# Altium PCB CW342_PCB.PcbDoc (part 1 of 3)
Units mil, origin at the board's own origin, x right, y up, seen from the top; angles counter-clockwise.
Board outline 3740.34 x 4080.75 mil, 4 copper layers (Top Layer, Layer 2 (GND), Layer 3, Bottom Layer), stack 23.756 mil thick; 89 components, 152 nets, 1082 pads, 424 vias.
Unrouted connection lines stored in the file: 58.
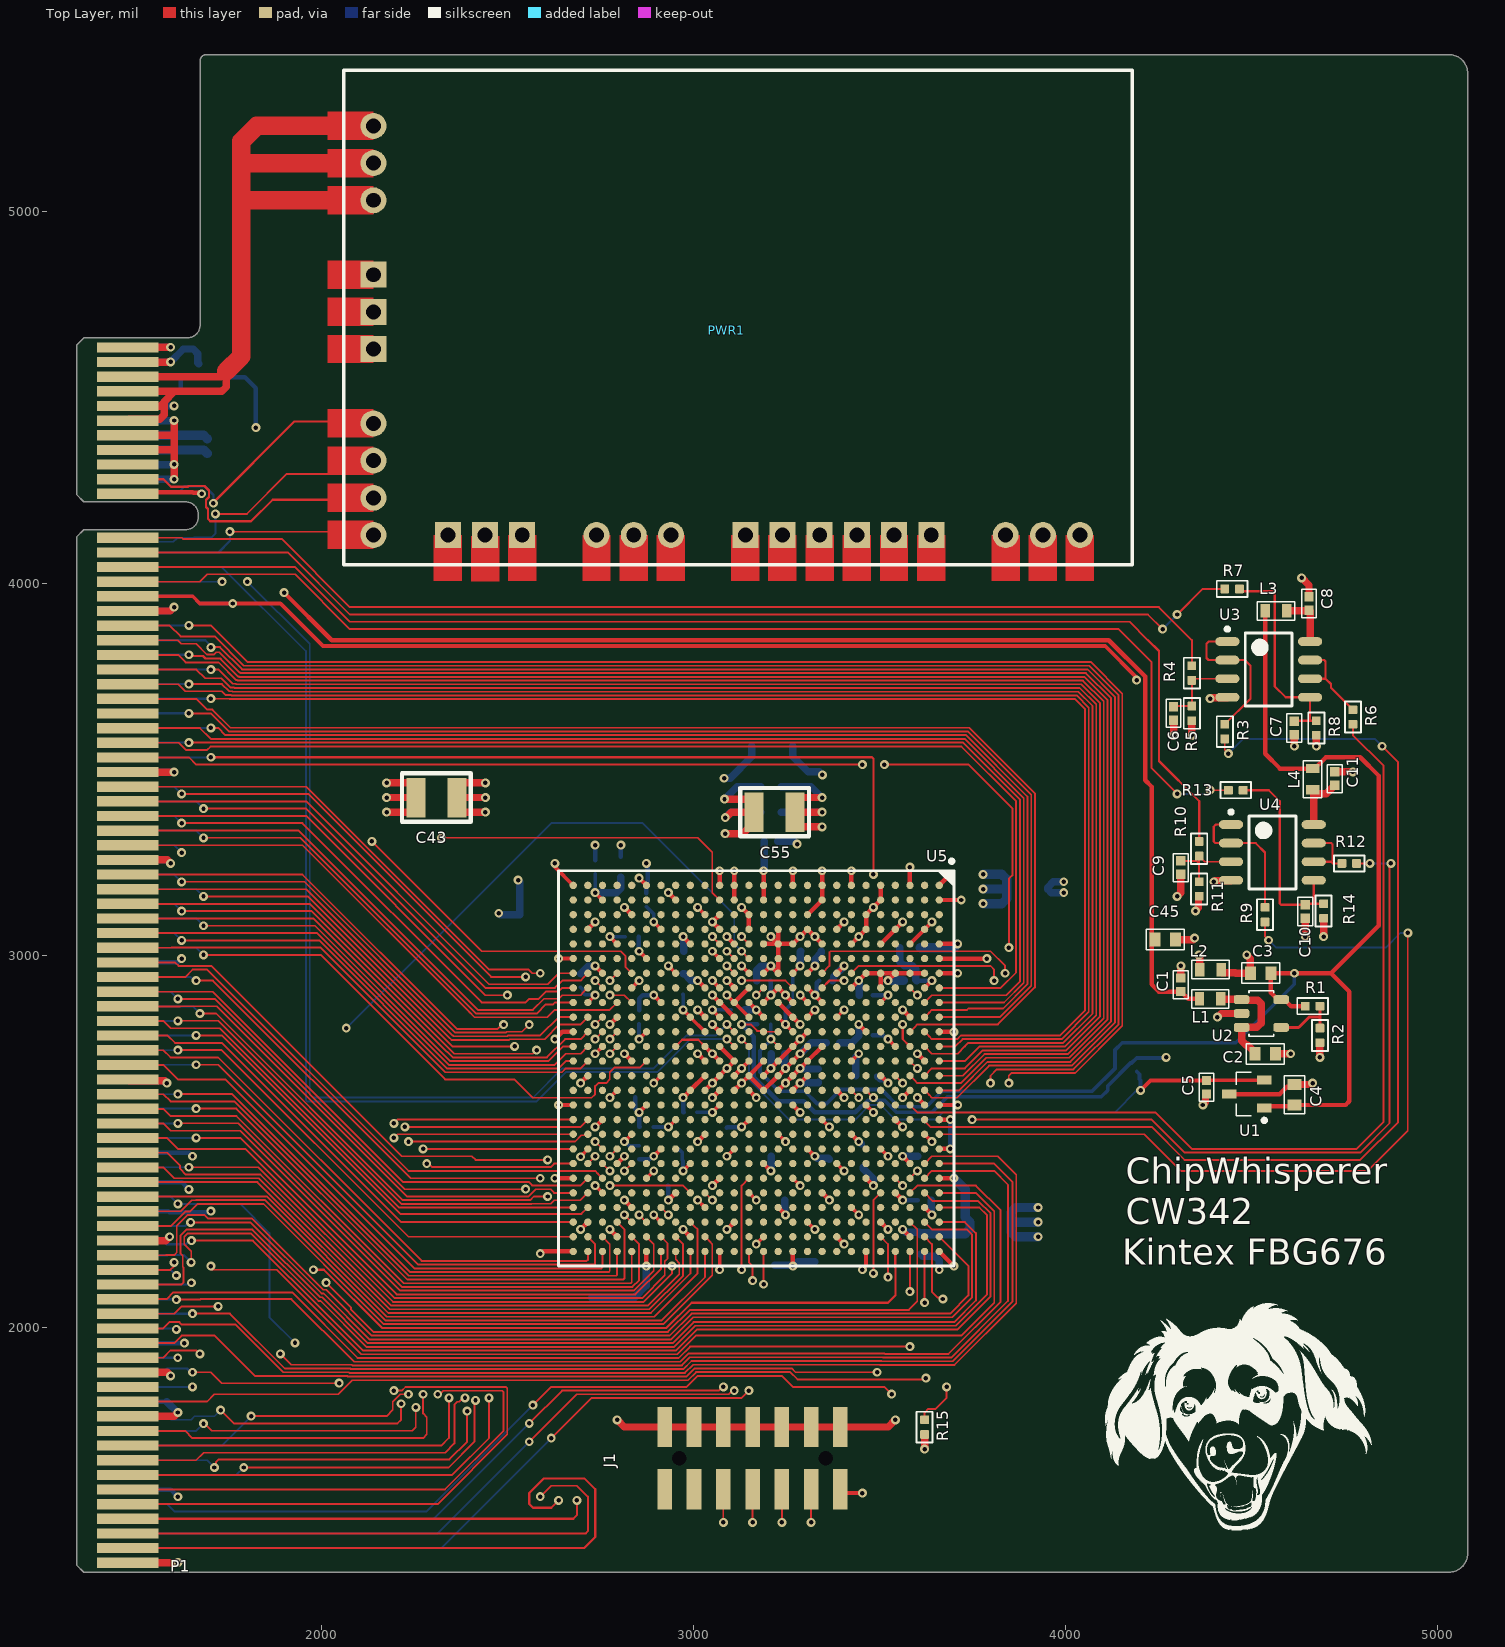
[diagram p0: Top Layer view]
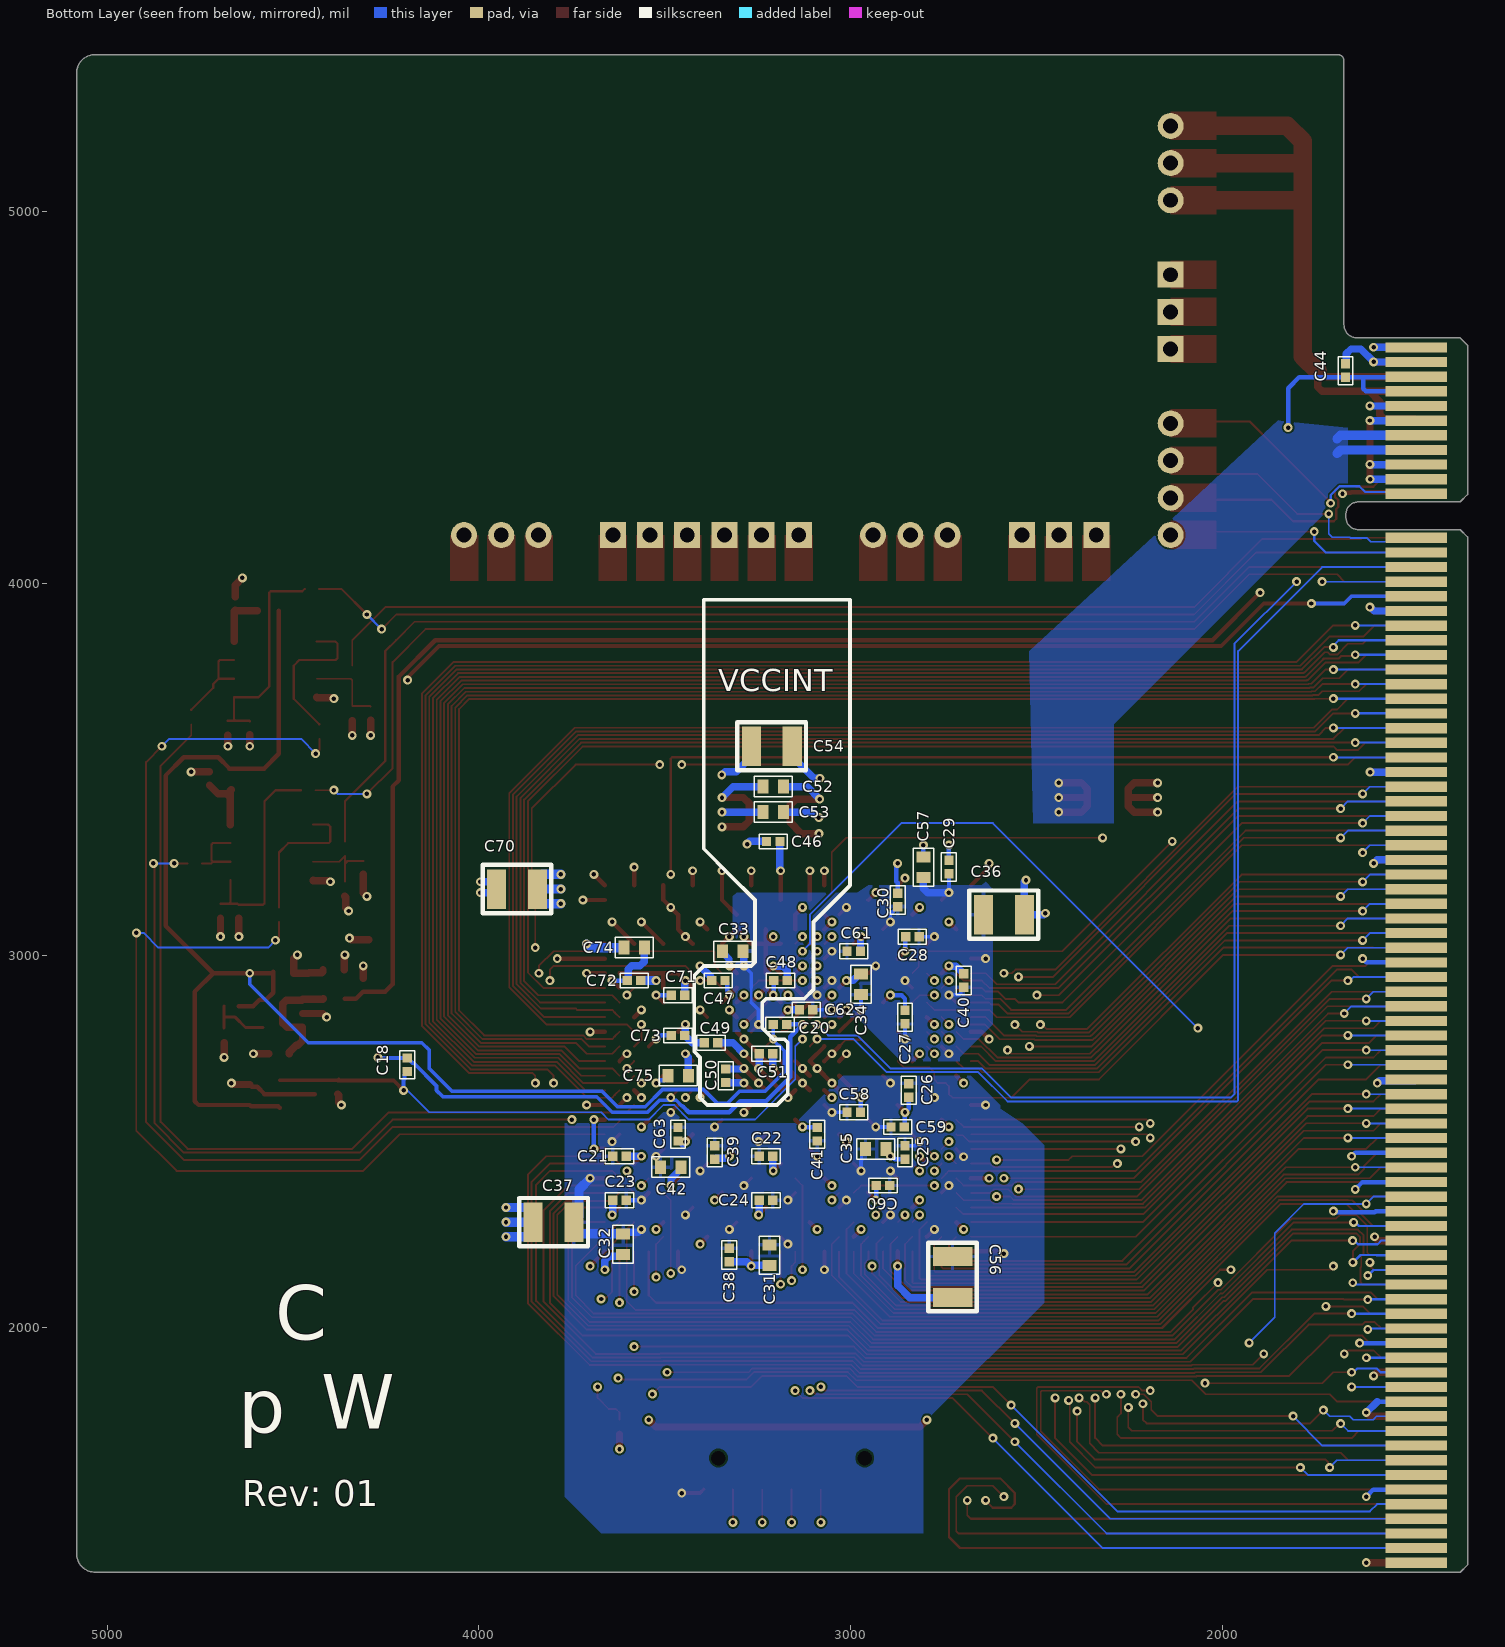
[diagram p1: Bottom Layer view, seen from below]
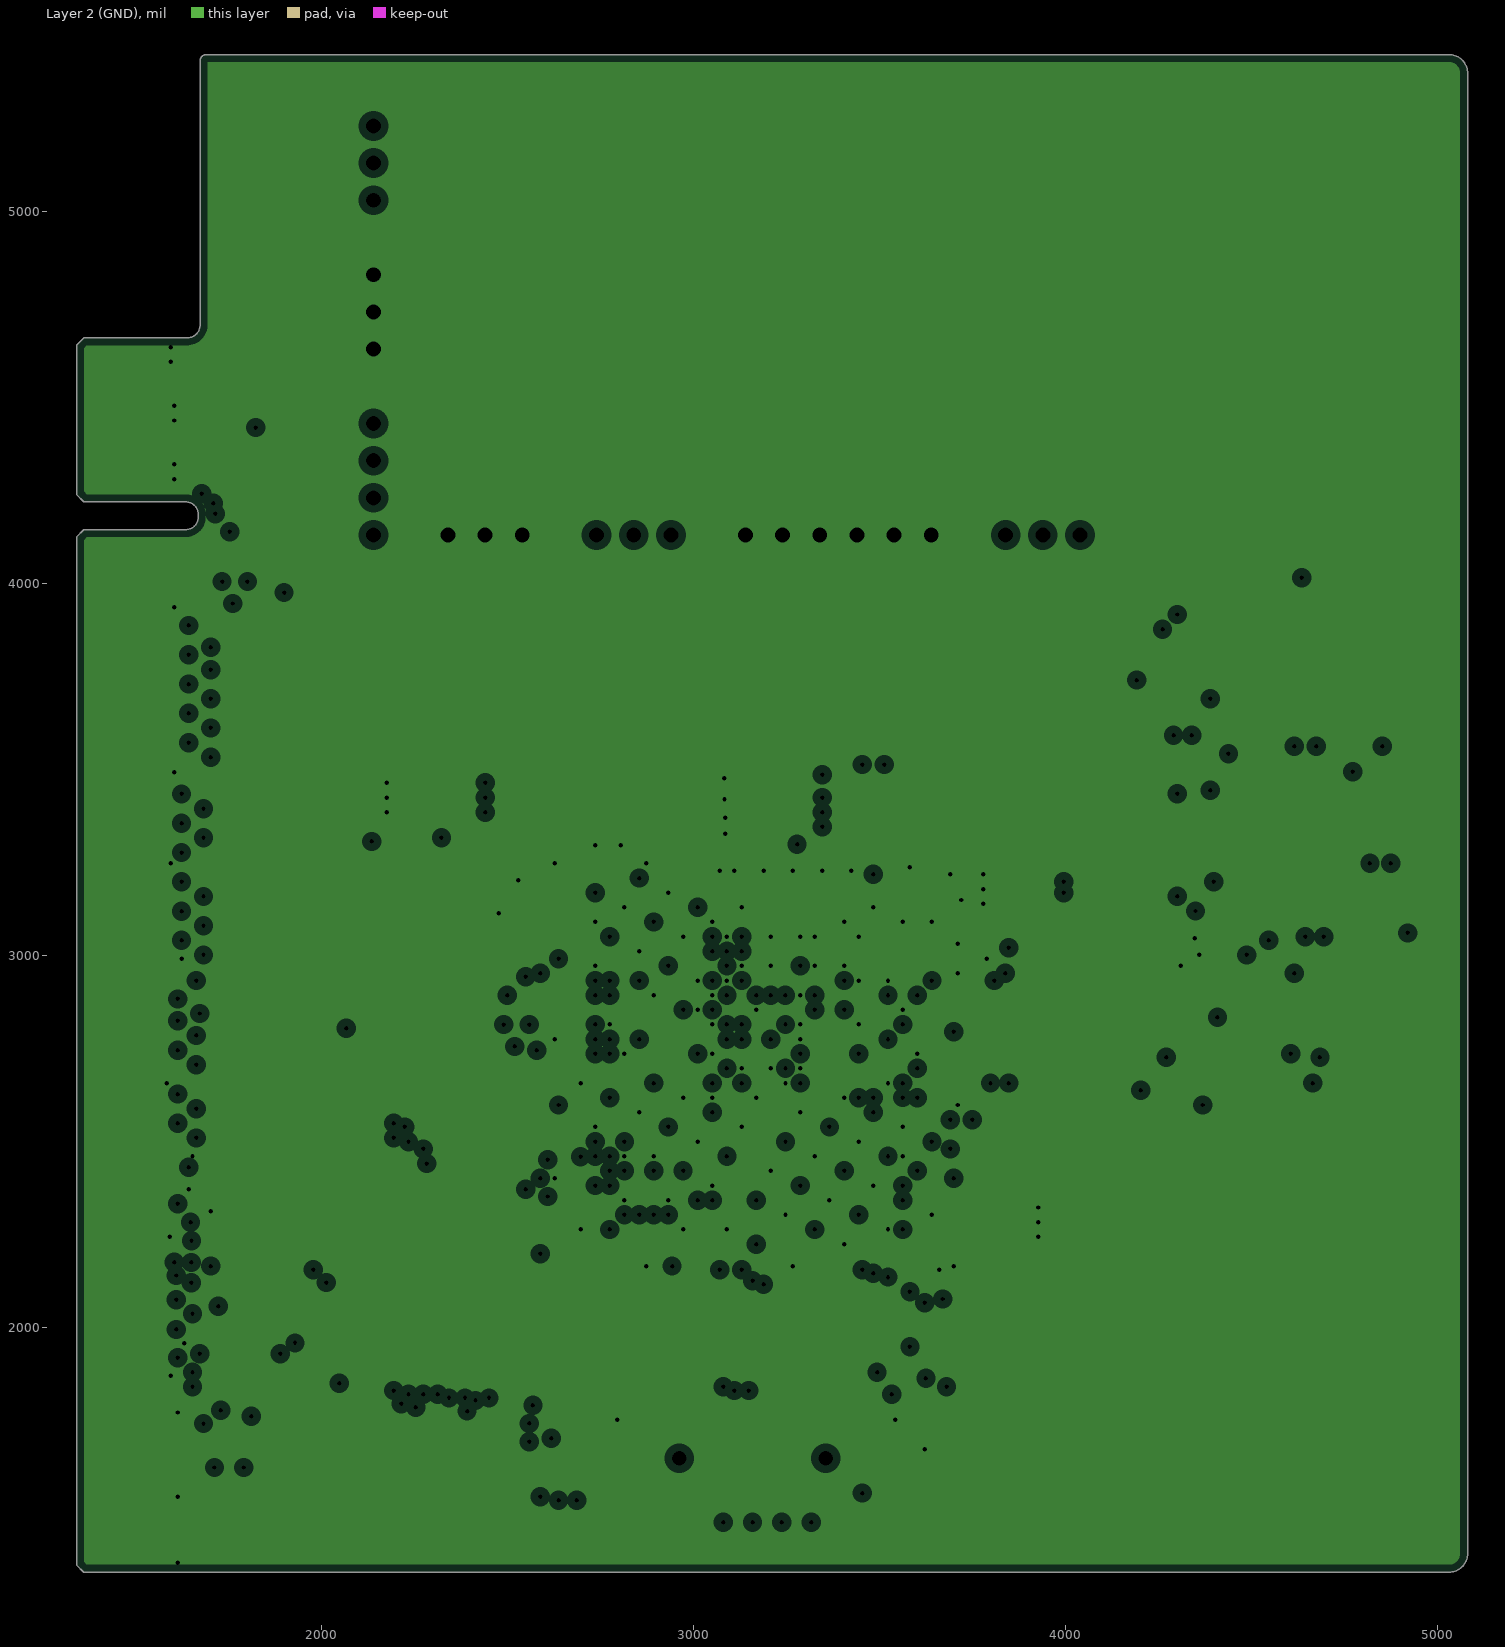
[diagram p2: Layer 2 (GND), clearances drawn from the general rule]
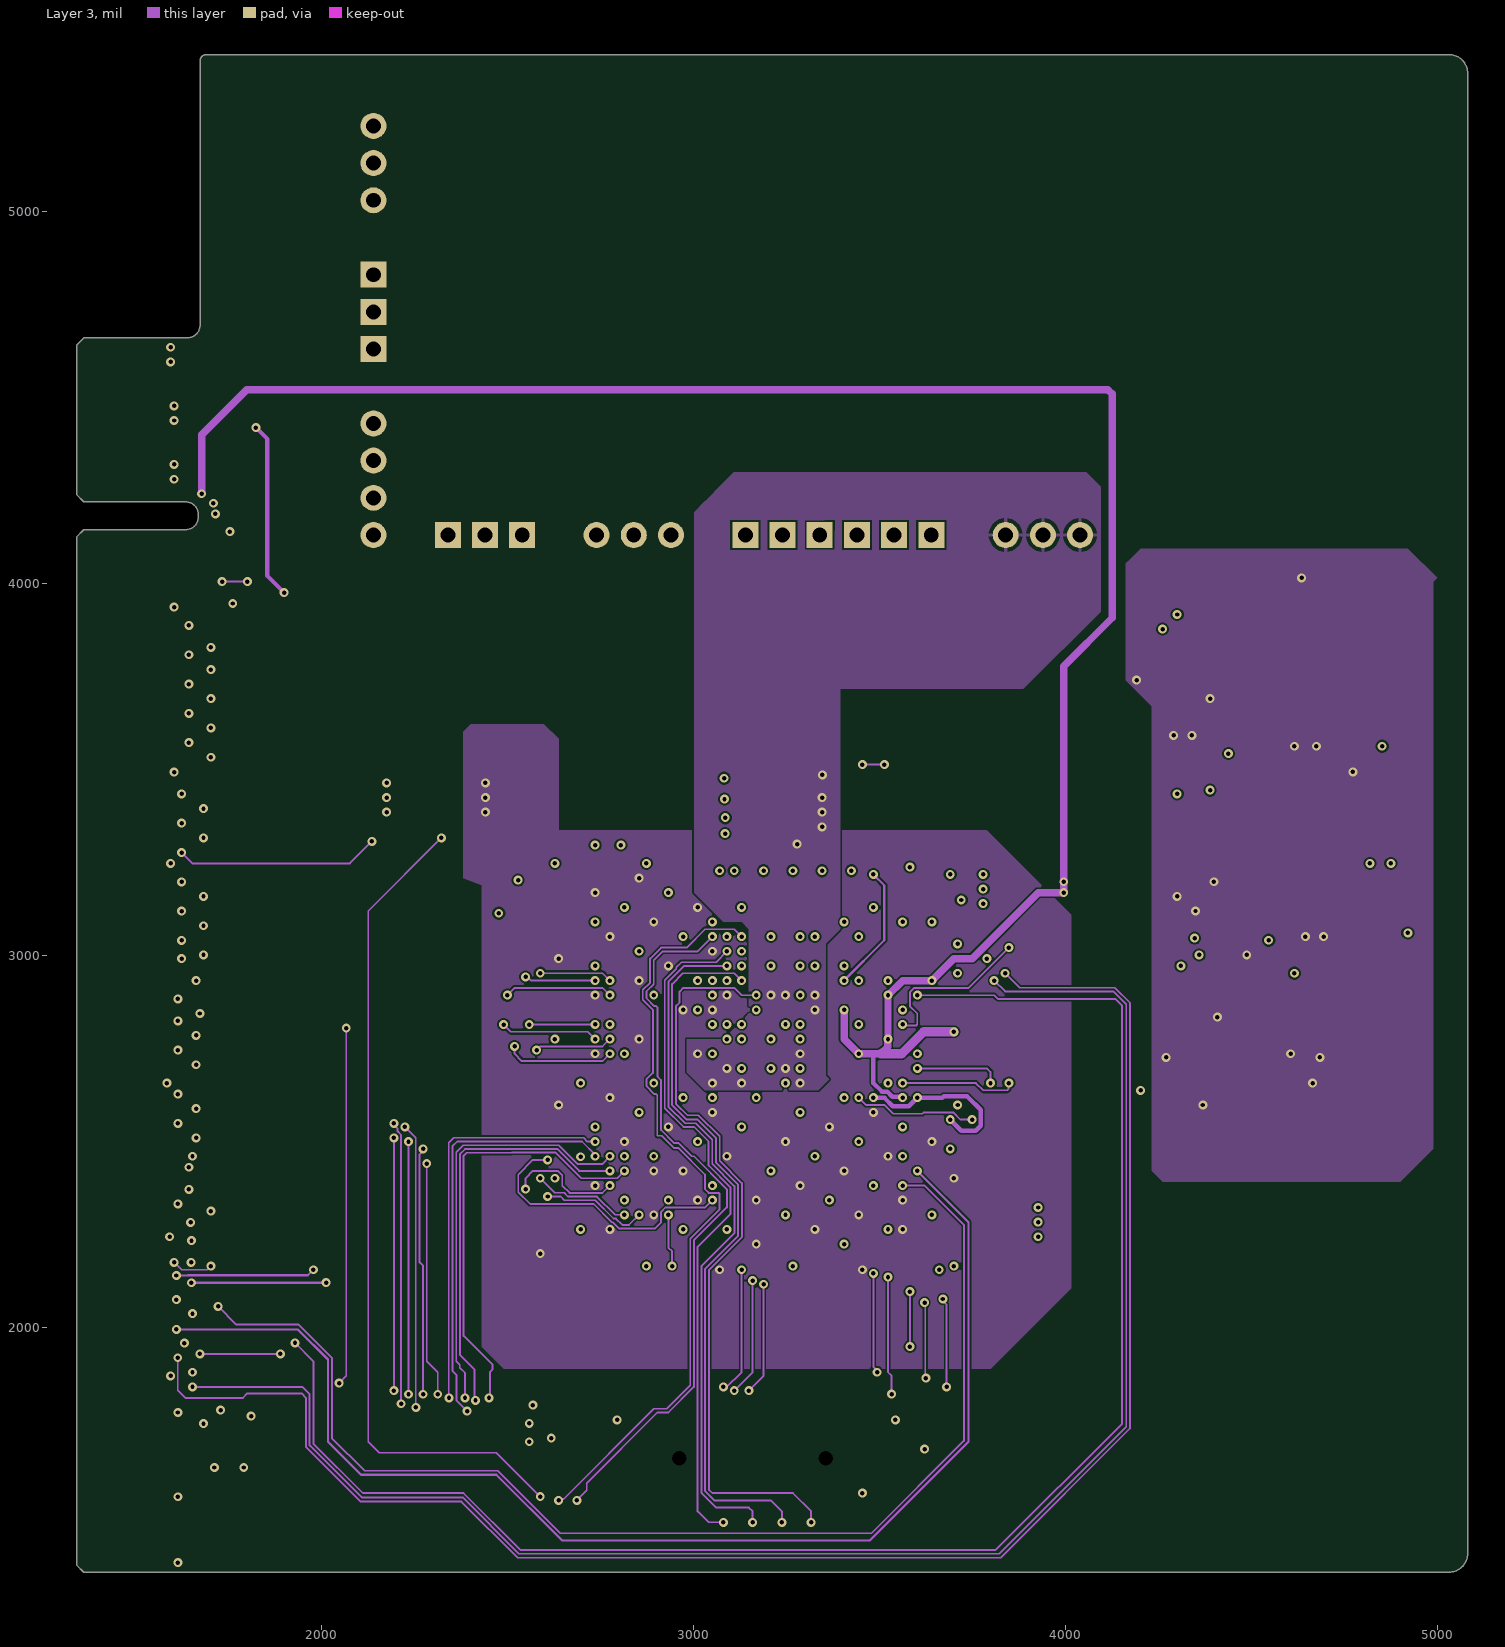
[diagram p3: Layer 3]
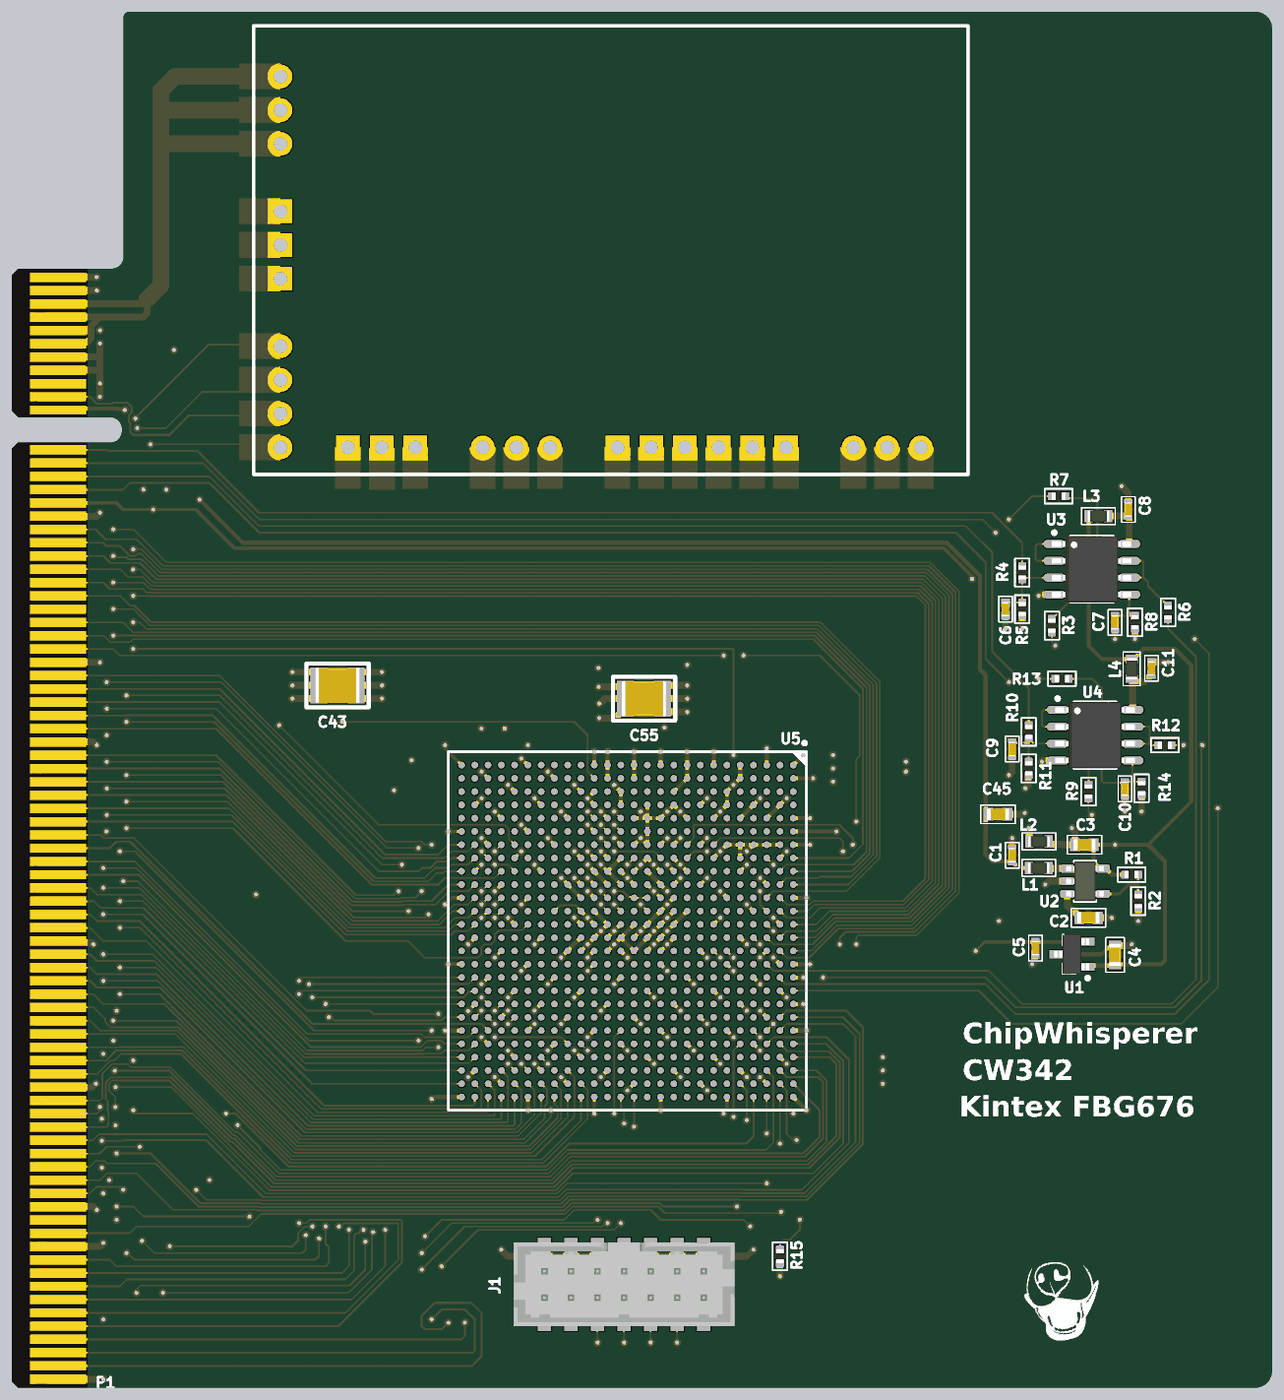
[diagram p6: 3D render of the assembled board from above, using the file's embedded part models]
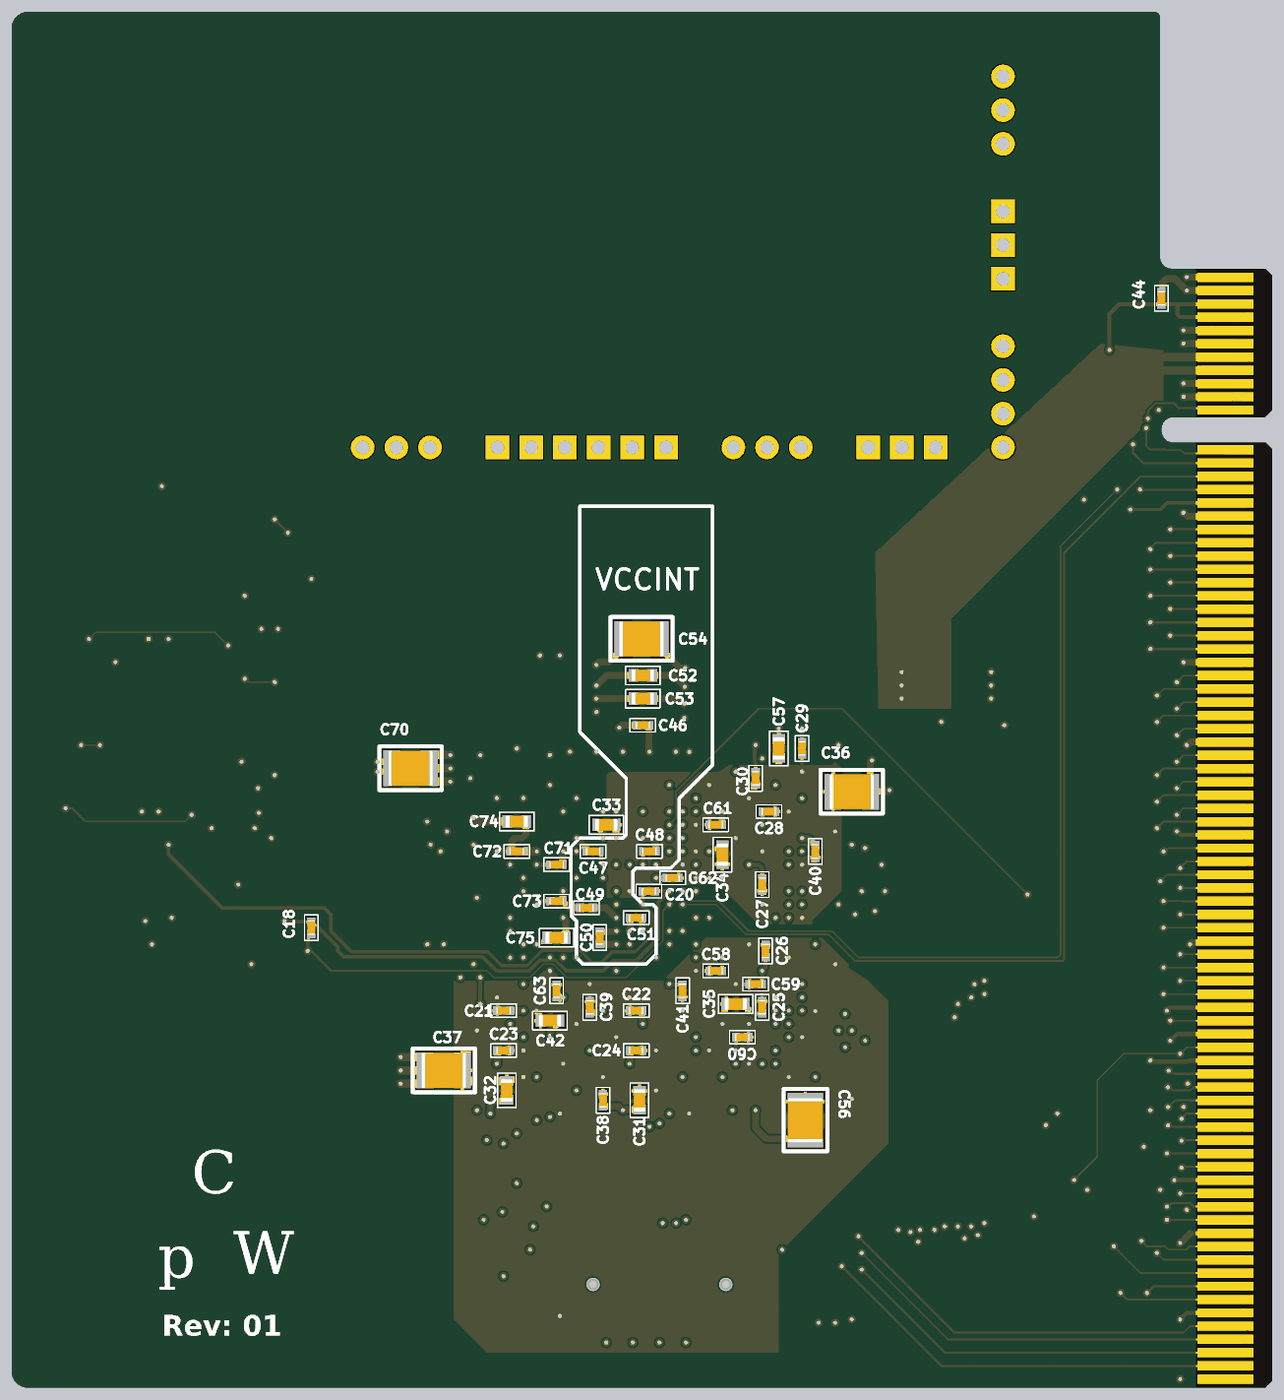
[diagram p7: 3D render of the assembled board from below, using the file's embedded part models]

## Layer stack, top to bottom
Top Solder: solder mask 0.4, Solder Resist, Dk 3.5
Top Layer: signal copper 1.4
Dielectric 2: prepreg 2.8, PP-006, Dk 4.1
Layer 2 (GND): plane copper 1.378, net GND
Dielectric 1: dielectric 12.6, FR-4, Dk 4.8
Layer 3: signal copper 1.378
Dielectric 3: prepreg 2.8, PP-006, Dk 4.1
Bottom Layer: signal copper 1.4
Bottom Solder: solder mask 0.4, Solder Resist, Dk 3.5

## Board outline
1361.35,1342.25 1341.66,1361.94 1341.66,4125.72 1361.35,4145.4 1634.97,4145.4 ccw(c1634.97,4179.43) 1669,4179.43 1669,4186.17 ccw(c1634.97,4186.17) 1634.97,4220.2 1361.35,4220.2 1341.66,4239.89 1341.66,4641.46 1361.35,4661.15 1638.98,4661.15 ccw(c1638.98,4696.17) 1674,4696.17 1674,5406 cw(c1691,5406) 1691,5423 5032,5423 cw(c5032,5373) 5082,5373 5082,1392.25 cw(c5032,1392.25) 5032,1342.25

## Design rules (kind name [scope] priority, off if disabled: settings)
BoardOutlineClearance Silk_to_Outline [(OnLayer('Top Overlay'))] p1: gap=0 ignorepadtopadclearanceinfootprint=FALSE
BoardOutlineClearance [All] p2: gap=20 ignorepadtopadclearanceinfootprint=FALSE
Clearance [All] p1: gap=5 ignorepadtopadclearanceinfootprint=FALSE except(0: Arc-Hole Track-Hole SMDPad-Hole THPad-Hole Via-Hole Fill-Hole Poly-Hole Region-Hole Text-Hole)
HoleSize [All] p1: absolutevalues=TRUE maxlimit=200 minlimit=1 maxpercent=80.000 minpercent=20.000
MinimumSolderMaskSliver [All] p1 off: minsoldermaskwidth=10
PlaneClearance [All] p1: clearance=20
PlaneConnect PlaneConnect_viaDirect [IsVia] p1: planeconnectstyle=Direct reliefexpansion=20 reliefentries=4 reliefconductorwidth=10 reliefairgap=10
PlaneConnect [All] p2: planeconnectstyle=Relief reliefexpansion=20 reliefentries=4 reliefconductorwidth=10 reliefairgap=10
PolygonConnect PolygonConnect_viaDirect [All vs isVia] p1: connectstyle=Direct reliefconductorwidth=10 reliefentries=4 polygonreliefangle="90 Angle" airgapwidth=10
PolygonConnect [All] p2: connectstyle=Relief reliefconductorwidth=10 reliefentries=4 polygonreliefangle="90 Angle" airgapwidth=10
RoutingVias [All] p1: holewidth=12 width=24 viastyle="Through Hole" minholewidth=12 minwidth=24 maxholewidth=28 maxwidth=50 viatemplateguid#1={3D63D98A-B8DD-4D8C-8428-75B7C829EE97} viatemplatename#1=v61h30m0mx0
SilkToSilkClearance [All] p1: silktosilkclearance=5
SilkToSolderMaskClearance [IsPad] p1: minsilkscreentomaskgap=5 clearancetoexposedcopper=TRUE
SolderMaskExpansion [All] p1: expansion=4 istentingtop=FALSE
Width [All] p1: maxlimit=100 minlimit=5 preferedwidth=8 midlayer1_prefwidth=5 minimp=50.000000 maximp=50.000000 favimp=50.000000
24 further rules are at their usual default settings.

## Classes and differential pairs
component class CW342_XADC: C1 C2 C3 C4 C5 C6 C7 C8 C9 C10 C11 L1 L2 L3 L4 R1 R2 R3 R4 R5 R6 R7 R8 R9 R10 R11 R12 R13 R14 U1 U2 U3 U4
component class CW342_FPGAIO_1: R15 U5
component class CW342_FPGA_PWR: C20
component class CW342_FPGA_DECOUP: C21 C22 C23 C24 C25 C26 C27 C28 C29 C30 C31 C32 C33 C34 C35 C36 C37 C38 C39 C40 C41 C42 C43 C44 C45 C46 C47 C48 C49 C50 C51 C52 C53 C54 C55 C56 C57 C58 C59 C60 C61 C62 C63 C70 C71 C72 C73 C74 C75
component class CW342_FPGA_CFG: C18 J1
component class CW342_Edge: P1 PWR1

## Components (designator, comment, footprint, x,y, rotation, side; value= is the part's Value field where it differs from the comment)
C1 "100n" CAPC0402_M 4311.02,2921.65 r90 top
C2 "1u" CAPC0603_M 4537.4,2736.22 r0 top
C3 "2u2" CAPC0603_M 4525.59,2952.76 r180 top
C4 "470n" CAPC0603_M 4616.14,2625.99 r90 top
C5 "100n" CAPC0402_M 4379.92,2646.06 r270 top
C6 "18p" CAPC0402_M 4291.34,3651.57 r270 top
C7 "18p" CAPC0402_M 4616.14,3612.2 r270 top
C8 "100n" CAPC0402_M 4655.51,3946.85 r90 top
C9 "18p" CAPC0402_M 4311.02,3236.61 r270 top
C10 "18p" CAPC0402_M 4645.67,3118.5 r270 top
C11 "100n" CAPC0402_M 4724.41,3475.98 r90 top
C18 "100n" CAPC0402_M 4192.29,2706.69 r90 bottom
C20 "100n" CAPC0402_M 3190.55,2814.96 r180 bottom
C21 "100n" CAPC0402_M 3622.05,2460.63 r180 bottom
C22 "100n" CAPC0402_M 3228.35,2460.63 r180 bottom
C23 "100n" CAPC0402_M 3622.05,2342.52 r0 bottom
C24 "100n" CAPC0402_M 3228.35,2342.52 r0 bottom
C25 "100n" CAPC0402_M 2854.33,2470.47 r270 bottom
C26 "100n" CAPC0402_M 2844.49,2637.8 r270 bottom
C27 "100n" CAPC0402_M 2854.33,2834.65 r90 bottom
C28 "100n" CAPC0402_M 2834.65,3051.18 r0 bottom
C29 "100n" CAPC0402_M 2736.22,3238.19 r90 bottom
C30 "100n" CAPC0402_M 2874.02,3149.61 r90 bottom
C31 "2u2" CAPC0603_M 3218.5,2194.88 r270 bottom
C32 "2u2" CAPC0603_M 3612.2,2224.41 r270 bottom
C33 "2u2" CAPC0603_M 3316.93,3011.81 r0 bottom
C34 "2u2" CAPC0603_M 2972.44,2923.23 r90 bottom
C35 "2u2" CAPC0603_M 2933.07,2480.32 r180 bottom
C36 "47uF" CAPC3225X20N 2588.58,3110.24 r180 bottom
C37 "47uF" CAPC3225X20N 3799.21,2283.46 r0 bottom
C38 "100n" CAPC0402_M 3326.77,2194.88 r270 bottom
C39 "100n" CAPC0402_M 3366.14,2470.47 r270 bottom
C40 "100n" CAPC0402_M 2696.85,2933.07 r90 bottom
C41 "100n" CAPC0402_M 3090.55,2519.68 r90 bottom
C42 "2u2" CAPC0603_M 3484.25,2431.1 r180 bottom
C43 "47uF" CAPC3225X20N 2309.05,3425.2 r180 top
C44 "100n" CAPC0402_M 1670,4573 r90 bottom
C45 "2u2" CAPC0603_M 4269,3043 r0 top
C46 "100n" CAPC0402_M 3208.66,3307.09 r180 bottom
C47 "100n" CAPC0402_M 3356.3,2933.07 r0 bottom
C48 "100n" CAPC0402_M 3188.98,2933.07 r180 bottom
C49 "100n" CAPC0402_M 3375.98,2765.75 r0 bottom
C50 "100n" CAPC0402_M 3336.61,2677.17 r90 bottom
C51 "100n" CAPC0402_M 3228.35,2736.22 r180 bottom
C52 "2u2" CAPC0603_M 3208.66,3454.72 r180 bottom
C53 "2u2" CAPC0603_M 3208.66,3385.83 r180 bottom
C54 "47uF" CAPC3225X20N 3212.6,3562.99 r180 bottom
C55 "47uF" CAPC3225X20N 3218.5,3385.83 r180 top
C56 "47uF" CAPC3225X20N 2726.38,2135.83 r270 bottom
C57 "2u2" CAPC0603_M 2805.12,3238.19 r90 bottom
C58 "100n" CAPC0402_M 2992.13,2578.74 r180 bottom
C59 "100n" CAPC0402_M 2874.02,2539.37 r180 bottom
C60 "100n" CAPC0402_M 2913.39,2381.89 r0 bottom
C61 "100n" CAPC0402_M 2992.13,3011.81 r180 bottom
C62 "100n" CAPC0402_M 3120.08,2854.33 r0 bottom
C63 "100n" CAPC0402_M 3464.57,2519.68 r270 bottom
C70 "47uF" CAPC3225X20N 3897.64,3179.13 r180 bottom
C71 "100n" CAPC0402_M 3464.57,2893.7 r180 bottom
C72 "100n" CAPC0402_M 3582.68,2933.07 r180 bottom
C73 "100n" CAPC0402_M 3464.57,2785.43 r180 bottom
C74 "2u2" CAPC0603_M 3582.68,3021.65 r0 bottom
C75 "2u2" CAPC0603_M 3464.57,2677.17 r0 bottom
J1 "87832-1420/XILINXJTAG" 87832-1420 3159.45,1648.82 r180 top
L1 "600-Ohm/0.5A" IND_0603 4389.76,2883.86 r0 top value=600R/0.5A
L2 "600-Ohm/0.5A" IND_0603 4390.55,2962.6 r0 top value=600R/0.5A
L3 "120-Ohm/3A" IND_0603 4566.93,3927.17 r180 top value=120R/3A
L4 "120-Ohm/3A" IND_0603 4665.35,3474.41 r90 top value=120R/3A
P1 "PCIeX16-GF-2D-1000-1K-O164" PCIeX16-GF-2D-1000-1K-O164 1480,4261.38 r270 top
PWR1 "CW330VCCINT" CW335_VCCINT_POWERSUPPLY 2057,4053 r0 top (schematic designator *)
R1 "2k7" RESC1005X40N 4665.35,2864.17 r0 top
R2 "1k" RESC1005X40N 4685.04,2785.43 r270 top
R3 "1k" RESC1005X40N 4429.13,3602.36 r270 top
R4 "680k" RESC1005X40N 4340.55,3759.84 r270 top
R5 "220k" RESC1005X40N 4340.55,3651.57 r270 top
R6 "1k" RESC1005X40N 4773.62,3641.73 r270 top
R7 "680k" RESC1005X40N 4448.82,3986.22 r0 top
R8 "220k" RESC1005X40N 4675.2,3612.2 r270 top
R9 "1k" RESC1005X40N 4537.4,3110.24 r270 top
R10 "680k" RESC1005X40N 4360.24,3287.4 r270 top
R11 "220k" RESC1005X40N 4360.24,3179.13 r270 top
R12 "1k" RESC1005X40N 4763.78,3248.03 r0 top
R13 "680k" RESC1005X40N 4458.66,3444.88 r0 top
R14 "220k" RESC1005X40N 4694.88,3120.08 r270 top
R15 "1k" RESC1005X40N 3622.05,1732.28 r270 top
U1 "REF3012AIDBZT" SOT95P237X112-3N 4488.19,2627.95 r180 top
U2 "Linear Voltage Regulator IC  1 Output  300mA TSOT-5" SOT23-5P95_285X145L45X40 4527.56,2844.49 r270 top
U3 "TLV8542DR" SOIC127P600X175-8N 4547.24,3769.68 r0 top
U4 "TLV8542DR" SOIC127P600X175-8N 4557.09,3277.56 r0 top
U5 "XC7K160T-1FBG676C" FBG676 3169.29,2696.85 r270 top

## Footprints (in the part's own frame and the unit in brackets; to place one, negate y for a bottom-side part, rotate by r counter-clockwise, add the part's x,y. Pads: shape width x height; smd on the part's side, far side on the other; paste and mask are expansions set on the pad)
87832-1420 [mm] "87832-1420 (Molex)"
  rect 1x2.75 smd: 1(-6,-2.13) 2(-6,2.13) 3(-4,-2.13) 4(-4,2.13) 5(-2,-2.13) 6(-2,2.13) 7(0,-2.13) 8(0,2.13) 9(2,-2.13) 10(2,2.13) 11(4,-2.13) 12(4,2.13) 13(6,-2.13) 14(6,2.13)
  round 0 hole 1 unplated: MH1(-5,0) MH2(5,0)
  body extent -8.32,-3.15 8.33,3.15, height 7.58
CAPC0402_M [mm] "Chip Capacitor, 2-Leads, Body 0402, IPC Medium Density"
  rect 0.64x0.64 smd mask+0.06: 1(-0.46,0) 2(0.46,0)
  silkscreen extent -0.97,-0.51 0.97,0.51, body extent -0.55,-0.3 0.55,0.3, height 0.6
CAPC0603_M [mm]
  rect 0.75x0.95 smd: 1(-0.7,0) 2(0.7,0)
  silkscreen extent -1.3,-0.7 1.3,0.7, body extent -0.85,-0.45 0.85,0.45, height 0.9
CAPC3225X20N [mm] "Chip Capacitor, 2-Leads, Body 3.18x2.53mm, IPC Medium Density"
  rect 1.3x2.7 smd: 1(-1.4,0) 2(1.4,0)
  silkscreen extent -2.35,-1.65 2.34,1.65, body extent -1.68,-1.33 1.68,1.33, height 2
CW335_VCCINT_POWERSUPPLY [mil]
  round 70 hole 40: 1(83,1178) 2(83,1078) 3(83,978) 7(83,378) 8(83,278) 9(83,178) 10(83,78) 14(683,78) 15(783,78) 16(883,78) 23(1783,78) 24(1883,78) 25(1983,78)
  rect 70x70 hole 40: 4(83,778) 5(83,678) 6(83,578) 11(283,78) 12(383,78) 13(483,78) 17(1083,78) 18(1183,78) 19(1283,78) 20(1383,78) 21(1483,78) 22(1583,78)
  Top Layer region: -40,1216.5 -40,1140 83,1140 83,1216.5
  Top Layer region: 3,413 3,343 83,343 83,413
  Top Layer region: -40,1116.5 -40,1040 83,1040 83,1116.5
  Top Layer region: -40,1016.5 -40,940 83,940 83,1016.5
  Top Layer region: -40,816.5 -40,740 83,740 83,816.5
  Top Layer region: -40,716.5 -40,640 83,640 83,716.5
  Top Layer region: -40,616.5 -40,540 83,540 83,616.5
  Top Layer region: -40,416.5 -40,340 83,340 83,416.5
  Top Layer region: -40,316.5 -40,240 83,240 83,316.5
  Top Layer region: -40,216.5 -40,140 83,140 83,216.5
  Top Layer region: -40,116.5 -40,40 83,40 83,116.5
  Top Layer region: 244.5,-45 321,-45 321,78 244.5,78
  Top Layer region: 345.7,-47.47 422.2,-47.47 422.2,75.53 345.7,75.53
  Top Layer region: 444.5,-45 521,-45 521,78 444.5,78
  Top Layer region: 644.5,-45 721,-45 721,78 644.5,78
  Top Layer region: 744.5,-45 821,-45 821,78 744.5,78
  Top Layer region: 844.5,-45 921,-45 921,78 844.5,78
  Top Layer region: 1044.5,-45 1121,-45 1121,78 1044.5,78
  Top Layer region: 1144.5,-45 1221,-45 1221,78 1144.5,78
  Top Layer region: 1244.5,-45 1321,-45 1321,78 1244.5,78
  Top Layer region: 1344.5,-45 1421,-45 1421,78 1344.5,78
  Top Layer region: 1444.5,-45 1521,-45 1521,78 1444.5,78
  Top Layer region: 1544.5,-45 1621,-45 1621,78 1544.5,78
  Top Layer region: 1744.5,-45 1821,-45 1821,78 1744.5,78
  Top Layer region: 1844.5,-45 1921,-45 1921,78 1844.5,78
  Top Layer region: 1944.5,-45 2021,-45 2021,78 1944.5,78
  silkscreen extent 3,-2 2123,1328
FBG676 [mm] "BGA, 676-Balls, Body 27x27mm, Pitch 1.0mm"
  round 0.5 smd: A1(-12.5,12.5) A2(-11.5,12.5) A3(-10.5,12.5) A4(-9.5,12.5) A5(-8.5,12.5) A6(-7.5,12.5) A7(-6.5,12.5) A8(-5.5,12.5) A9(-4.5,12.5) A10(-3.5,12.5) A11(-2.5,12.5) A12(-1.5,12.5) A13(-0.5,12.5) A14(0.5,12.5) A15(1.5,12.5) A16(2.5,12.5) A17(3.5,12.5) A18(4.5,12.5) A19(5.5,12.5) A20(6.5,12.5) A21(7.5,12.5) A22(8.5,12.5) A23(9.5,12.5) A24(10.5,12.5) A25(11.5,12.5) A26(12.5,12.5) AA1(-12.5,-7.5) AA2(-11.5,-7.5) AA3(-10.5,-7.5) AA4(-9.5,-7.5) AA5(-8.5,-7.5) AA6(-7.5,-7.5) AA7(-6.5,-7.5) AA8(-5.5,-7.5) AA9(-4.5,-7.5) AA10(-3.5,-7.5) AA11(-2.5,-7.5) AA12(-1.5,-7.5) AA13(-0.5,-7.5) AA14(0.5,-7.5) AA15(1.5,-7.5) AA16(2.5,-7.5) AA17(3.5,-7.5) AA18(4.5,-7.5) AA19(5.5,-7.5) AA20(6.5,-7.5) AA21(7.5,-7.5) AA22(8.5,-7.5) AA23(9.5,-7.5) AA24(10.5,-7.5) AA25(11.5,-7.5) AA26(12.5,-7.5) AB1(-12.5,-8.5) AB2(-11.5,-8.5) AB3(-10.5,-8.5) AB4(-9.5,-8.5) AB5(-8.5,-8.5) AB6(-7.5,-8.5) AB7(-6.5,-8.5) AB8(-5.5,-8.5) AB9(-4.5,-8.5) AB10(-3.5,-8.5) AB11(-2.5,-8.5) AB12(-1.5,-8.5) AB13(-0.5,-8.5) AB14(0.5,-8.5) AB15(1.5,-8.5) AB16(2.5,-8.5) AB17(3.5,-8.5) AB18(4.5,-8.5) AB19(5.5,-8.5) AB20(6.5,-8.5) AB21(7.5,-8.5) AB22(8.5,-8.5) AB23(9.5,-8.5) AB24(10.5,-8.5) AB25(11.5,-8.5) AB26(12.5,-8.5) AC1(-12.5,-9.5) AC2(-11.5,-9.5) AC3(-10.5,-9.5) AC4(-9.5,-9.5) AC5(-8.5,-9.5) AC6(-7.5,-9.5) AC7(-6.5,-9.5) AC8(-5.5,-9.5) AC9(-4.5,-9.5) AC10(-3.5,-9.5) AC11(-2.5,-9.5) AC12(-1.5,-9.5) AC13(-0.5,-9.5) AC14(0.5,-9.5) AC15(1.5,-9.5) AC16(2.5,-9.5) AC17(3.5,-9.5) AC18(4.5,-9.5) AC19(5.5,-9.5) AC20(6.5,-9.5) AC21(7.5,-9.5) AC22(8.5,-9.5) AC23(9.5,-9.5) AC24(10.5,-9.5) AC25(11.5,-9.5) AC26(12.5,-9.5) AD1(-12.5,-10.5) AD2(-11.5,-10.5) AD3(-10.5,-10.5) AD4(-9.5,-10.5) AD5(-8.5,-10.5) AD6(-7.5,-10.5) AD7(-6.5,-10.5) AD8(-5.5,-10.5) AD9(-4.5,-10.5) AD10(-3.5,-10.5) AD11(-2.5,-10.5) AD12(-1.5,-10.5) AD13(-0.5,-10.5) AD14(0.5,-10.5) AD15(1.5,-10.5) AD16(2.5,-10.5) AD17(3.5,-10.5) AD18(4.5,-10.5) AD19(5.5,-10.5) AD20(6.5,-10.5) AD21(7.5,-10.5) AD22(8.5,-10.5) AD23(9.5,-10.5) AD24(10.5,-10.5) AD25(11.5,-10.5) AD26(12.5,-10.5) AE1(-12.5,-11.5) AE2(-11.5,-11.5) AE3(-10.5,-11.5) AE4(-9.5,-11.5) AE5(-8.5,-11.5) AE6(-7.5,-11.5) AE7(-6.5,-11.5) AE8(-5.5,-11.5) AE9(-4.5,-11.5) AE10(-3.5,-11.5) AE11(-2.5,-11.5) AE12(-1.5,-11.5) AE13(-0.5,-11.5) AE14(0.5,-11.5) AE15(1.5,-11.5) AE16(2.5,-11.5) AE17(3.5,-11.5) AE18(4.5,-11.5) AE19(5.5,-11.5) AE20(6.5,-11.5) AE21(7.5,-11.5) AE22(8.5,-11.5) AE23(9.5,-11.5) AE24(10.5,-11.5) AE25(11.5,-11.5) AE26(12.5,-11.5) AF1(-12.5,-12.5) AF2(-11.5,-12.5) AF3(-10.5,-12.5) AF4(-9.5,-12.5) AF5(-8.5,-12.5) AF6(-7.5,-12.5) AF7(-6.5,-12.5) AF8(-5.5,-12.5) AF9(-4.5,-12.5) AF10(-3.5,-12.5) AF11(-2.5,-12.5) AF12(-1.5,-12.5) AF13(-0.5,-12.5) AF14(0.5,-12.5) AF15(1.5,-12.5) AF16(2.5,-12.5) AF17(3.5,-12.5) AF18(4.5,-12.5) AF19(5.5,-12.5) AF20(6.5,-12.5) AF21(7.5,-12.5) AF22(8.5,-12.5) AF23(9.5,-12.5) AF24(10.5,-12.5) AF25(11.5,-12.5) AF26(12.5,-12.5) B1(-12.5,11.5) B2(-11.5,11.5) B3(-10.5,11.5) B4(-9.5,11.5) B5(-8.5,11.5) B6(-7.5,11.5) B7(-6.5,11.5) B8(-5.5,11.5) B9(-4.5,11.5) B10(-3.5,11.5) B11(-2.5,11.5) B12(-1.5,11.5) B13(-0.5,11.5) B14(0.5,11.5) B15(1.5,11.5) B16(2.5,11.5) B17(3.5,11.5) B18(4.5,11.5) B19(5.5,11.5) B20(6.5,11.5) B21(7.5,11.5) B22(8.5,11.5) B23(9.5,11.5) B24(10.5,11.5) B25(11.5,11.5) B26(12.5,11.5) C1(-12.5,10.5) C2(-11.5,10.5) C3(-10.5,10.5) C4(-9.5,10.5) C5(-8.5,10.5) C6(-7.5,10.5) C7(-6.5,10.5) C8(-5.5,10.5) C9(-4.5,10.5) C10(-3.5,10.5) C11(-2.5,10.5) C12(-1.5,10.5) C13(-0.5,10.5) C14(0.5,10.5) C15(1.5,10.5) C16(2.5,10.5) C17(3.5,10.5) C18(4.5,10.5) C19(5.5,10.5) C20(6.5,10.5) C21(7.5,10.5) C22(8.5,10.5) C23(9.5,10.5) C24(10.5,10.5) C25(11.5,10.5) C26(12.5,10.5) D1(-12.5,9.5) D2(-11.5,9.5) D3(-10.5,9.5) D4(-9.5,9.5) D5(-8.5,9.5) D6(-7.5,9.5) D7(-6.5,9.5) D8(-5.5,9.5) D9(-4.5,9.5) D10(-3.5,9.5) D11(-2.5,9.5) D12(-1.5,9.5) D13(-0.5,9.5) D14(0.5,9.5) D15(1.5,9.5) D16(2.5,9.5) D17(3.5,9.5) D18(4.5,9.5) D19(5.5,9.5) D20(6.5,9.5) D21(7.5,9.5) D22(8.5,9.5) D23(9.5,9.5) D24(10.5,9.5) D25(11.5,9.5) D26(12.5,9.5) E1(-12.5,8.5) E2(-11.5,8.5) E3(-10.5,8.5) E4(-9.5,8.5) E5(-8.5,8.5) E6(-7.5,8.5) E7(-6.5,8.5) E8(-5.5,8.5) E9(-4.5,8.5) E10(-3.5,8.5) E11(-2.5,8.5) E12(-1.5,8.5) E13(-0.5,8.5) E14(0.5,8.5) E15(1.5,8.5) E16(2.5,8.5) E17(3.5,8.5) E18(4.5,8.5) E19(5.5,8.5) E20(6.5,8.5) E21(7.5,8.5) E22(8.5,8.5) E23(9.5,8.5) E24(10.5,8.5) E25(11.5,8.5) E26(12.5,8.5) F1(-12.5,7.5) F2(-11.5,7.5) F3(-10.5,7.5) F4(-9.5,7.5) F5(-8.5,7.5) F6(-7.5,7.5) F7(-6.5,7.5) F8(-5.5,7.5) F9(-4.5,7.5) F10(-3.5,7.5) F11(-2.5,7.5) F12(-1.5,7.5) F13(-0.5,7.5) F14(0.5,7.5) F15(1.5,7.5) F16(2.5,7.5) F17(3.5,7.5) F18(4.5,7.5) F19(5.5,7.5) F20(6.5,7.5) F21(7.5,7.5) F22(8.5,7.5) F23(9.5,7.5) F24(10.5,7.5) F25(11.5,7.5) F26(12.5,7.5) G1(-12.5,6.5) G2(-11.5,6.5) G3(-10.5,6.5) G4(-9.5,6.5) G5(-8.5,6.5) G6(-7.5,6.5) G7(-6.5,6.5) G8(-5.5,6.5) G9(-4.5,6.5) G10(-3.5,6.5) G11(-2.5,6.5) G12(-1.5,6.5) G13(-0.5,6.5) G14(0.5,6.5) G15(1.5,6.5) G16(2.5,6.5) G17(3.5,6.5) G18(4.5,6.5) G19(5.5,6.5) G20(6.5,6.5) G21(7.5,6.5) G22(8.5,6.5) G23(9.5,6.5) G24(10.5,6.5) G25(11.5,6.5) G26(12.5,6.5) H1(-12.5,5.5) H2(-11.5,5.5) H3(-10.5,5.5) H4(-9.5,5.5) H5(-8.5,5.5) H6(-7.5,5.5) H7(-6.5,5.5) H8(-5.5,5.5) H9(-4.5,5.5) H10(-3.5,5.5) H11(-2.5,5.5) H12(-1.5,5.5) H13(-0.5,5.5) H14(0.5,5.5) H15(1.5,5.5) H16(2.5,5.5) H17(3.5,5.5) H18(4.5,5.5) H19(5.5,5.5) H20(6.5,5.5) H21(7.5,5.5) H22(8.5,5.5) H23(9.5,5.5) H24(10.5,5.5) H25(11.5,5.5) H26(12.5,5.5) J1(-12.5,4.5) J2(-11.5,4.5) J3(-10.5,4.5) J4(-9.5,4.5) J5(-8.5,4.5) J6(-7.5,4.5) J7(-6.5,4.5) J8(-5.5,4.5) J9(-4.5,4.5) J10(-3.5,4.5) J11(-2.5,4.5) J12(-1.5,4.5) J13(-0.5,4.5) J14(0.5,4.5) J15(1.5,4.5) J16(2.5,4.5) J17(3.5,4.5) J18(4.5,4.5) J19(5.5,4.5) J20(6.5,4.5) J21(7.5,4.5) J22(8.5,4.5) J23(9.5,4.5) J24(10.5,4.5) J25(11.5,4.5) J26(12.5,4.5) K1(-12.5,3.5) K2(-11.5,3.5) K3(-10.5,3.5) K4(-9.5,3.5) K5(-8.5,3.5) K6(-7.5,3.5) K7(-6.5,3.5) K8(-5.5,3.5) K9(-4.5,3.5) K10(-3.5,3.5) K11(-2.5,3.5) K12(-1.5,3.5) K13(-0.5,3.5) K14(0.5,3.5) K15(1.5,3.5) K16(2.5,3.5) K17(3.5,3.5) K18(4.5,3.5) K19(5.5,3.5) K20(6.5,3.5) K21(7.5,3.5) K22(8.5,3.5) K23(9.5,3.5) K24(10.5,3.5) K25(11.5,3.5) K26(12.5,3.5) L1(-12.5,2.5) L2(-11.5,2.5) L3(-10.5,2.5) L4(-9.5,2.5) L5(-8.5,2.5) L6(-7.5,2.5) L7(-6.5,2.5) L8(-5.5,2.5) L9(-4.5,2.5) L10(-3.5,2.5) L11(-2.5,2.5) L12(-1.5,2.5) L13(-0.5,2.5) L14(0.5,2.5) L15(1.5,2.5) L16(2.5,2.5) L17(3.5,2.5) L18(4.5,2.5) L19(5.5,2.5) L20(6.5,2.5) L21(7.5,2.5) L22(8.5,2.5) L23(9.5,2.5) L24(10.5,2.5) L25(11.5,2.5) L26(12.5,2.5) M1(-12.5,1.5) M2(-11.5,1.5) M3(-10.5,1.5) M4(-9.5,1.5) M5(-8.5,1.5) M6(-7.5,1.5) M7(-6.5,1.5) M8(-5.5,1.5) M9(-4.5,1.5) M10(-3.5,1.5) M11(-2.5,1.5) M12(-1.5,1.5) M13(-0.5,1.5) M14(0.5,1.5) M15(1.5,1.5) M16(2.5,1.5) M17(3.5,1.5) M18(4.5,1.5) M19(5.5,1.5) M20(6.5,1.5) M21(7.5,1.5) M22(8.5,1.5) M23(9.5,1.5) M24(10.5,1.5) M25(11.5,1.5) M26(12.5,1.5) N1(-12.5,0.5) N2(-11.5,0.5) N3(-10.5,0.5) N4(-9.5,0.5) N5(-8.5,0.5) N6(-7.5,0.5) N7(-6.5,0.5) N8(-5.5,0.5) N9(-4.5,0.5) N10(-3.5,0.5) N11(-2.5,0.5) N12(-1.5,0.5) N13(-0.5,0.5) N14(0.5,0.5) N15(1.5,0.5) N16(2.5,0.5) N17(3.5,0.5) N18(4.5,0.5) N19(5.5,0.5) N20(6.5,0.5) N21(7.5,0.5) N22(8.5,0.5) N23(9.5,0.5) N24(10.5,0.5) N25(11.5,0.5) N26(12.5,0.5) P1(-12.5,-0.5) P2(-11.5,-0.5) P3(-10.5,-0.5) P4(-9.5,-0.5) P5(-8.5,-0.5) P6(-7.5,-0.5) P7(-6.5,-0.5) P8(-5.5,-0.5) P9(-4.5,-0.5) P10(-3.5,-0.5) P11(-2.5,-0.5) P12(-1.5,-0.5) P13(-0.5,-0.5) P14(0.5,-0.5) P15(1.5,-0.5) P16(2.5,-0.5) P17(3.5,-0.5) P18(4.5,-0.5) P19(5.5,-0.5) P20(6.5,-0.5) P21(7.5,-0.5) P22(8.5,-0.5) P23(9.5,-0.5) P24(10.5,-0.5) P25(11.5,-0.5) P26(12.5,-0.5) R1(-12.5,-1.5) R2(-11.5,-1.5) R3(-10.5,-1.5) R4(-9.5,-1.5) R5(-8.5,-1.5) R6(-7.5,-1.5) R7(-6.5,-1.5) R8(-5.5,-1.5) R9(-4.5,-1.5) R10(-3.5,-1.5) R11(-2.5,-1.5) R12(-1.5,-1.5) R13(-0.5,-1.5) R14(0.5,-1.5) R15(1.5,-1.5) R16(2.5,-1.5) R17(3.5,-1.5) R18(4.5,-1.5) R19(5.5,-1.5) R20(6.5,-1.5) R21(7.5,-1.5) R22(8.5,-1.5) R23(9.5,-1.5) R24(10.5,-1.5) R25(11.5,-1.5) R26(12.5,-1.5) T1(-12.5,-2.5) T2(-11.5,-2.5) T3(-10.5,-2.5) T4(-9.5,-2.5) T5(-8.5,-2.5) T6(-7.5,-2.5) T7(-6.5,-2.5) T8(-5.5,-2.5) T9(-4.5,-2.5) T10(-3.5,-2.5) T11(-2.5,-2.5) T12(-1.5,-2.5) T13(-0.5,-2.5) T14(0.5,-2.5) T15(1.5,-2.5) T16(2.5,-2.5) T17(3.5,-2.5) T18(4.5,-2.5) T19(5.5,-2.5) T20(6.5,-2.5) T21(7.5,-2.5) T22(8.5,-2.5) T23(9.5,-2.5) T24(10.5,-2.5) T25(11.5,-2.5) T26(12.5,-2.5) U1(-12.5,-3.5) U2(-11.5,-3.5) U3(-10.5,-3.5) U4(-9.5,-3.5) U5(-8.5,-3.5) U6(-7.5,-3.5) U7(-6.5,-3.5) U8(-5.5,-3.5) U9(-4.5,-3.5) U10(-3.5,-3.5) U11(-2.5,-3.5) U12(-1.5,-3.5) U13(-0.5,-3.5) U14(0.5,-3.5) U15(1.5,-3.5) U16(2.5,-3.5) U17(3.5,-3.5) U18(4.5,-3.5) U19(5.5,-3.5) U20(6.5,-3.5) U21(7.5,-3.5) U22(8.5,-3.5) U23(9.5,-3.5) U24(10.5,-3.5) U25(11.5,-3.5) U26(12.5,-3.5) V1(-12.5,-4.5) V2(-11.5,-4.5) V3(-10.5,-4.5) V4(-9.5,-4.5) V5(-8.5,-4.5) V6(-7.5,-4.5) V7(-6.5,-4.5) V8(-5.5,-4.5) V9(-4.5,-4.5) V10(-3.5,-4.5) V11(-2.5,-4.5) V12(-1.5,-4.5) V13(-0.5,-4.5) V14(0.5,-4.5) V15(1.5,-4.5) V16(2.5,-4.5) V17(3.5,-4.5) V18(4.5,-4.5) V19(5.5,-4.5) V20(6.5,-4.5) V21(7.5,-4.5) V22(8.5,-4.5) V23(9.5,-4.5) V24(10.5,-4.5) V25(11.5,-4.5) V26(12.5,-4.5) W1(-12.5,-5.5) W2(-11.5,-5.5) W3(-10.5,-5.5) W4(-9.5,-5.5) W5(-8.5,-5.5) W6(-7.5,-5.5) W7(-6.5,-5.5) W8(-5.5,-5.5) W9(-4.5,-5.5) W10(-3.5,-5.5) W11(-2.5,-5.5) W12(-1.5,-5.5) W13(-0.5,-5.5) W14(0.5,-5.5) W15(1.5,-5.5) W16(2.5,-5.5) W17(3.5,-5.5) W18(4.5,-5.5) W19(5.5,-5.5) W20(6.5,-5.5) W21(7.5,-5.5) W22(8.5,-5.5) W23(9.5,-5.5) W24(10.5,-5.5) W25(11.5,-5.5) W26(12.5,-5.5) Y1(-12.5,-6.5) Y2(-11.5,-6.5) Y3(-10.5,-6.5) Y4(-9.5,-6.5) Y5(-8.5,-6.5) Y6(-7.5,-6.5) Y7(-6.5,-6.5) Y8(-5.5,-6.5) Y9(-4.5,-6.5) Y10(-3.5,-6.5) Y11(-2.5,-6.5) Y12(-1.5,-6.5) Y13(-0.5,-6.5) Y14(0.5,-6.5) Y15(1.5,-6.5) Y16(2.5,-6.5) Y17(3.5,-6.5) Y18(4.5,-6.5) Y19(5.5,-6.5) Y20(6.5,-6.5) Y21(7.5,-6.5) Y22(8.5,-6.5) Y23(9.5,-6.5) Y24(10.5,-6.5) Y25(11.5,-6.5) Y26(12.5,-6.5)
  silkscreen extent -14.27,-13.5 13.5,13.5, body extent -13.5,-13.5 13.5,13.5, height 2.54
IND_0603 [mm] "Chip Inductor, 2-Leads, Body 1.60x0.80mm, IPC Medium Density"
  rect 0.64x0.92 smd: 1(-0.73,0) 2(0.73,0)
  Top Layer pour cut-out: -0.686,0.457 0.838,0.457 0.838,-0.457 -0.686,-0.457
  silkscreen extent -1.27,-0.64 1.27,0.64, body extent -0.82,-0.43 0.82,0.43, height 0.9
PCIeX16-GF-2D-1000-1K-O164 [mm] "Golden finger, PCIeX16, Dual, Opposite, Pitch 1mm, 164-Position"
  rect 0.7x4.2 smd far side paste-1: A1(-9.5,0) A2(-8.5,0) A3(-7.5,0) A4(-6.5,0) A5(-5.5,0) A6(-4.5,0) A7(-3.5,0) A8(-2.5,0) A9(-1.5,0) A10(-0.5,0) A11(0.5,0) A12(3.5,0) A13(4.5,0) A14(5.5,0) A15(6.5,0) A16(7.5,0) A17(8.5,0) A18(9.5,0) A19(10.5,0) A20(11.5,0) A21(12.5,0) A22(13.5,0) A23(14.5,0) A24(15.5,0) A25(16.5,0) A26(17.5,0) A27(18.5,0) A28(19.5,0) A29(20.5,0) A30(21.5,0) A31(22.5,0) A32(23.5,0) A33(24.5,0) A34(25.5,0) A35(26.5,0) A36(27.5,0) A37(28.5,0) A38(29.5,0) A39(30.5,0) A40(31.5,0) A41(32.5,0) A42(33.5,0) A43(34.5,0) A44(35.5,0) A45(36.5,0) A46(37.5,0) A47(38.5,0) A48(39.5,0) A49(40.5,0) A50(41.5,0) A51(42.5,0) A52(43.5,0) A53(44.5,0) A54(45.5,0) A55(46.5,0) A56(47.5,0) A57(48.5,0) A58(49.5,0) A59(50.5,0) A60(51.5,0) A61(52.5,0) A62(53.5,0) A63(54.5,0) A64(55.5,0) A65(56.5,0) A66(57.5,0) A67(58.5,0) A68(59.5,0) A69(60.5,0) A70(61.5,0) A71(62.5,0) A72(63.5,0) A73(64.5,0) A74(65.5,0) A75(66.5,0) A76(67.5,0) A77(68.5,0) A78(69.5,0) A79(70.5,0) A80(71.5,0) A81(72.5,0) A82(73.5,0)
  rect 0.7x4.2 smd paste-1: B1(-9.5,0) B2(-8.5,0) B3(-7.5,0) B4(-6.5,0) B5(-5.5,0) B6(-4.5,0) B7(-3.5,0) B8(-2.5,0) B9(-1.5,0) B10(-0.5,0) B11(0.5,0) B12(3.5,0) B13(4.5,0) B14(5.5,0) B15(6.5,0) B16(7.5,0) B17(8.5,0) B18(9.5,0) B19(10.5,0) B20(11.5,0) B21(12.5,0) B22(13.5,0) B23(14.5,0) B24(15.5,0) B25(16.5,0) B26(17.5,0) B27(18.5,0) B28(19.5,0) B29(20.5,0) B30(21.5,0) B31(22.5,0) B32(23.5,0) B33(24.5,0) B34(25.5,0) B35(26.5,0) B36(27.5,0) B37(28.5,0) B38(29.5,0) B39(30.5,0) B40(31.5,0) B41(32.5,0) B42(33.5,0) B43(34.5,0) B44(35.5,0) B45(36.5,0) B46(37.5,0) B47(38.5,0) B48(39.5,0) B49(40.5,0) B50(41.5,0) B51(42.5,0) B52(43.5,0) B53(44.5,0) B54(45.5,0) B55(46.5,0) B56(47.5,0) B57(48.5,0) B58(49.5,0) B59(50.5,0) B60(51.5,0) B61(52.5,0) B62(53.5,0) B63(54.5,0) B64(55.5,0) B65(56.5,0) B66(57.5,0) B67(58.5,0) B68(59.5,0) B69(60.5,0) B70(61.5,0) B71(62.5,0) B72(63.5,0) B73(64.5,0) B74(65.5,0) B75(66.5,0) B76(67.5,0) B77(68.5,0) B78(69.5,0) B79(70.5,0) B80(71.5,0) B81(72.5,0) B82(73.5,0)
RESC1005X40N [mm] "Chip Resistor, Body 1.0x0.5mm, EIA 0402, IPC Medium Density"
  round 0.2 on Mech15: 0(0,0)
  rrect20% 0.6x0.6 smd: 1(-0.5,0) 2(0.5,0)
  Top Layer pour cut-out: -0.325,0.375 -0.2,0.5 0.2,0.5 0.325,0.375 0.325,-0.375 0.2,-0.5 -0.2,-0.5 -0.325,-0.375
  silkscreen extent -1.05,-0.55 1.05,0.55, body extent -0.52,-0.27 0.53,0.28, height 0.4
SOIC127P600X175-8N [mm] "SOIC, 8-Leads, Body 4.90x3.90mm, Pitch 1.27mm, IPC Medium Density"
  oval 1.65x0.6 smd: 1(-2.825,1.905) 2(-2.825,0.635) 3(-2.825,-0.635) 4(-2.825,-1.905) 5(2.825,-1.905) 6(2.825,-0.635) 7(2.825,0.635) 8(2.825,1.905)
  silkscreen extent -2.95,-2.5 1.6,2.88, body extent -3,-2.5 3,2.5, height 1.75
SOT23-5P95_285X145L45X40 [mm] "Small Outline Transistor (SOT23), 0.95 mm pitch; 5 pin, 3.00 mm L X 1.60 mm W X 1.45 mm H body"
  rrect50% 0.6x1.05 smd: 1(-0.95,-1.35) 2(0,-1.35) 3(0.95,-1.35) 4(0.95,1.35) 5(-0.95,1.35)
  silkscreen extent -1.55,-0.85 1.55,0.85, body extent -1.5,-1.43 1.5,1.43, height 1.45
SOT95P237X112-3N [mm] "SOT23, 3-Leads, Body 2.92x2.37mm, Pitch 0.95mm, IPC Medium Density"
  rect 1x0.6 smd: 1(-1.2,0.95) 2(-1.2,-0.95) 3(1.2,0)
  silkscreen extent -1.33,-1.5 0.7,1.92, body extent -1.32,-1.52 1.32,1.52, height 1.12

## Part data
C1 C5 C8 C11 C18 C20 C21 C22 C23 C24 C25 C26 C27 C28 C29 C30 C38 C39 C40 C41 C44 C46 C47 C48 C49 C50 C51 C58 C59 C60 C61 C62 C63 C71 C72 C73: library part CCHIP-100n-0402, "100n, 0402", Case-EIA=0402, Manufacture Part Number 1=CGA2B3X7R1V104K050BB, Supplier Part Number 1=445-6901-1-ND, Component Group=Capacitor, Component Type=Standard, Mounting Technology=SMT, Part Number=CCHIP-100n-0402, Pin Count=2, Supplier 1=Digi-Key
C2: library part CCHIP-1u-0603, "1u, 0603, 50V", Case-EIA=0603, Case-Metric=1608, Manufacture Part Number 1=CL10A105KB8NNNC, Rated Voltage=50VDC, Supplier Part Number 1=1276-1860-1-ND, Component Group=Capacitor, Component Type=Standard, Mounting Technology=SMT, Part Number=CCHIP-1u-0603, Pin Count=2, Supplier 1=Digi-Key
C3: library part CCHIP-2u2-0603-25V, "2u2, 0603", Case-EIA=0603, Case-Metric=1608, Manufacture 1="Murata Electronics North America", Manufacture Part Number 1=GRM188R61E225MA12D, Rated Voltage=25VDC, Supplier Part Number 1=490-12738-1-ND, Tolerance=±20%, Component Group=Capacitor, Component Type=Standard, Mounting Technology=SMT, Part Number=CCHIP-2u2-0603-25V, Pin Count=2, RoHS=Yes, Supplier 1=Digi-Key
C4: library part CCHIP-470n-0603-50V, "470n, 0603, 50V", Case-EIA=0603, Manufacture 1="Taiyo Yuden", Manufacture Part Number 1=UMK107B7474KA-TR, Rated Voltage=50VDC, Supplier Part Number 1=587-3170-1-ND, Temperature Range="-55C to 125C", Component Group=Capacitor, Component Type=Standard, Mounting Technology=SMT, Part Number=CCHIP-470n-0603-50V, Pin Count=2, RoHS=Yes, Supplier 1=Digi-Key
C6 C7 C9 C10: library part CCHIP-18p-0402, "18p, 0402", Case-EIA=0402, Manufacture Part Number 1=GRM1555C1H180JA01D, Supplier Part Number 1=490-5858-1-ND, Component Group=Capacitor, Component Type=Standard, Mounting Technology=SMT, Part Number=CCHIP-18p-0402, Pin Count=2, Supplier 1=Digi-Key
C31 C32 C33 C34 C35 C42 C45 C52 C53 C57 C74 C75: library part CCHIP-2u2-0603, "2u2, 0603", Case-EIA=0603, Case-Metric=1608, Manufacture 1=Samsung, Manufacture Part Number 1=CL10B225KP8NNNC, Rated Voltage=10VDC, Supplier Part Number 1=1276-1134-1-ND, Component Group=Capacitor, Component Type=Standard, Mounting Technology=SMT, Part Number=CCHIP-2u2-0603, Pin Count=2, Supplier 1=Digi-Key
C36 C37 C43 C54 C55 C56 C70: library part CCHIP-47u-1210, "47u, 10V, 1210, Ceramic", Case-EIA=1210, Case-Metric=3225, Manufacture 1="TDK Corporation", Manufacture Part Number 1=C3225X5R1A476M250AC, Rated Voltage=10VDC, Supplier Part Number 1=445-6711-1-ND, Temperature Range="-55C to 85C", Tolerance=20%, Component Group=Capacitor, Component Type=Standard, Mounting Technology=SMT, Part Number=CCHIP-47u-1210, Pin Count=2, Supplier 1=Digi-Key
J1: "Molex 14-pin SMD, JTAG Pinout", Manufacture 1=Molex, Manufacture 1 Part Number=87832-1420, Supplier Part Number 1=WM18641-ND, Supplier 1=Digi-Key
L1 L2: library part FBCHIP-600R-0603, "600 Ohm @ 100 MHz, 0.5A rated FB", Case-EIA=0603, Case-Metric=1608, Manufacture 1="Murata Electronics", Manufacture Part Number 1=BLM18AG601SN1D, Rated Power=0.5A, Supplier Part Number 1=490-1014-2-ND, Component Group=Inductor, Component Type=Standard, Part Number=FBCHIP-600R-0603, Pin Count=2, PP Material Stack=0, PP Rotation=0, Supplier 1=Digi-Key
L3 L4: library part FBCHIP-120R-0603, "120 Ohm @ 100 MHz, 3A rated FB", Case-EIA=0603, Case-Metric=1680, Manufacture 1="Murata Electronics", Manufacture Part Number 1=BLM18SG121TN1D, Rated Power=3A, Supplier Part Number 1=490-3996-1-ND, Component Group=Inductor, Component Type=Standard, Part Number=FBCHIP-120R-0603, Pin Count=2, PP Material Stack=0, PP Rotation=0, Supplier 1=Digi-Key
P1: library part CMP-002-00047-1, "Golden Finger, PCIeX16, Dual, Opposite, Pitch 1mm, 164-Position", Package Description="Edge Connector, Golden Finger, Pitch 1 mm, 2 x 82 Position", Case/Package=PCIeX16-GF-2D-1000-1K-O164, Connector Type=EdgeConnector, Gender=Male, Mounting Technology=SM, Package Reference=PCIeX16-GF-2D-1000-1K-O164, Pins=164
R1: library part RCHIP-2K7-0402, "2k7 res, 0402, 1%, 1/16W", Case-EIA=0402, Case-Metric=1005, Manufacture 1=Yageo, Manufacture Part Number 1=RC0402FR-072K7L, Rated Power=0.063W, Rated Voltage=75VDC, Supplier Part Number 1=311-2.70KLRCT-ND, Temperature Range="-55C to 155C", Tolerance=1%, Component Group=Resistor, Component Type=Standard, Mounting Technology=SMT, Part Number=RCHIP-2K7-0402, Pin Count=2, Supplier 1=Digi-Key
R2 R3 R6 R9 R12 R15: library part RCHIP-1K-0402, "1k res, 0402, 1%, 1/16W", Case-EIA=0402, Case-Metric=1005, Manufacture 1=Yageo, Manufacture Part Number 1=RC0402FR-071KL, Rated Power=0.063W, Rated Voltage=75VDC, Supplier Part Number 1=311-1.00KLRCT-ND, Temperature Range="-55C to 155C", Tolerance=1%, Component Group=Resistor, Component Type=Standard, Mounting Technology=SMT, Part Number=RCHIP-1K-0402, Pin Count=2, Supplier 1=Digi-Key
R4 R7 R10 R13: library part RCHIP-680K-0402, "680k res, 0402, 1%, 1/16W", Case-EIA=0402, Case-Metric=1005, Manufacture 1=Yageo, Manufacture Part Number 1=RC0402FR-07680KL, Rated Power=0.063W, Rated Voltage=75VDC, Supplier Part Number 1=YAG3211CT-ND, Temperature Range="-55C to 155C", Tolerance=1%, Component Group=Resistor, Component Type=Standard, Mounting Technology=SMT, Part Number=RCHIP-680K-0402, Pin Count=2, Supplier 1=Digi-Key
R5 R8 R11 R14: library part RCHIP-220K-0402, "220k res, 0402, 1%, 1/16W", Case-EIA=0402, Case-Metric=1005, Manufacture 1=Yageo, Manufacture Part Number 1=RC0402FR-07220KL, Rated Power=0.063W, Rated Voltage=75VDC, Supplier Part Number 1=311-220KLRCT-ND, Temperature Range="-55C to 155C", Tolerance=1%, Component Group=Resistor, Component Type=Standard, Mounting Technology=SMT, Part Number=RCHIP-220K-0402, Pin Count=2, Supplier 1=Digi-Key
U1: "IC VREF SERIES 0.2% SOT23-3", Case/Package=SOT-23, Manufacture 1="Texas Instruments", Max Input Voltage=5.5V, Max Operating Temperature=125°C, Max Output Current=25mA, Max Output Voltage=1.25V, Max Supply Current=50uA, Min Input Voltage=1.8V, Min Operating Temperature=-40°C, Min Output Voltage=1.248V, Nominal Supply Current=42uA, Package Quantity=1, Supplier Part Number 1=REF3012AIDBZTTR-ND, Temperature Coefficient=50ppm/°C, Category="Voltage References", Component Group="Analog IC", Component Type=Standard, ComponentLink3Description=https://datasheet.ciiva.com/2007/ref3012-2007154.pdf?src-supplier=Digi-Key, ComponentLink3URL=https://datasheet.ciiva.com/2007/ref3012-2007154.pdf?src-supplier=Digi-Key, ComponentLink4Description=https://datasheet.ciiva.com/2007/ref3012-2007155.pdf?src-supplier=Digi-Key, ComponentLink4URL=https://datasheet.ciiva.com/2007/ref3012-2007155.pdf?src-supplier=Digi-Key, ComponentLink5Description=https://datasheet.ciiva.com/3235/ref3033-3235533.pdf?src-supplier=Avnet, ComponentLink5URL=https://datasheet.ciiva.com/3235/ref3033-3235533.pdf?src-supplier=Avnet, ComponentLink6Description=https://datasheet.ciiva.com/3235/ref3033-3235534.pdf?src-supplier=Avnet, ComponentLink6URL=https://datasheet.ciiva.com/3235/ref3033-3235534.pdf?src-supplier=Avnet, Height=1mm, Lead Free="Lead Free", Length=2.92mm, Manufacture Part Number 1=REF3012AIDBZT, Manufacturer Part Number=REF3012AIDBZT, Mounting Technology=SMT, Number of Channels=1, Number of Pins=3, Output Current=25mA, Output Voltage=1.25V, Packaging="Tape and Reel", Part Number=REF3012AIDBZT, Pin Count=3, PP Material Stack=0, PP Rotation=0, Pricing 1="1=1.18000, 10=1.05300, 25=0.99960, 100=0.76760 (USD)", Quiescent Current=50uA, Radiation Hardening=No, REACH SVHC="No SVHC", Reference Type=Series,Fixed, Reference Voltage=1.25V, RoHS=Yes, Stock 1=7831, Supplier 1=Digi-Key, Termination=SMD/SMT, Width=1.3mm
U2: library part ADP123AUJZ-R7, "IC REG LIN POS ADJ 300MA TSOT5", Case/Package=TSOT, Dropout Voltage=85mV, Manufacture 1="Analog Devices Inc.", Max Input Voltage=5.5V, Max Operating Temperature=125°C, Max Output Current=300mA, Max Output Voltage=5V, Max Supply Current=170uA, Min Current Limit=350mA, Min Input Voltage=2.3V, Min Operating Temperature=-40°C, Min Output Voltage=800mV, Nominal Supply Current=45uA, Output Voltage Accuracy=1%, Power Supply Rejection Ratio (PSRR)=60dB, Reference Voltage=500mV, Supplier Part Number 1=ADP123AUJZ-R7TR-ND, Accuracy=1%, Category="Voltage Regulators - Linear", Component Group="Analog IC", Component Type=Standard, ComponentLink3Description=https://datasheet.ciiva.com/2040/adp122-123-2040698.pdf?src-supplier=Digi-Key, ComponentLink3URL=https://datasheet.ciiva.com/2040/adp122-123-2040698.pdf?src-supplier=Digi-Key, ComponentLink4Description=https://datasheet.ciiva.com/2040/adp122-123-2040699.pdf?src-supplier=Digi-Key, ComponentLink4URL=https://datasheet.ciiva.com/2040/adp122-123-2040699.pdf?src-supplier=Digi-Key, Contact Plating=Tin,Matte, Height=0.9mm, Lead Free="Contains Lead", Length=2.9mm, Manufacture Part Number 1=ADP123AUJZ-R7, Manufacturer Part Number=ADP123AUJZ-R7, Mounting Technology=SMT, Number of Outputs=1, Number of Pins=5, Number of Regulators=1, Operating Supply Current=45uA, Output Current=300mA, Output Type=Adjustable, Output Voltage=5V, Packaging="Tape and Reel", Part Number=ADP123AUJZ-R7, Pin Count=5, Polarity=Positive, PP Material Stack=0, PP Rotation=0, Pricing 1="1=1.16000, 10=1.03300, 25=0.98000, 100=0.75250, 250=0.66500, 500=0.63000, 1000=0.49000 (USD)", Quiescent Current=45uA, REACH SVHC="No SVHC", Stock 1=14167, Supplier 1=Digi-Key, Width=1.6mm
U3 U4: library part LM2904_SOIC8, "IC OP-AMP GP", Manufacture 1="Texas Instruments", Supplier Part Number 1=296-48991-1-ND, Component Group="Analog IC", Component Type=Standard, Manufacture Part Number 1=TLV8542DR, Mounting Technology=SMT, Part Number=LM2904_SOIC8, Pin Count=8, PP Material Stack=0, PP Rotation=0, RoHS=Yes, Supplier 1=Digi-Key
U5: library part CMP-0361-00025-2, "Kintex-7 FPGA, 400 User I/Os, 8 GTX, 676-Ball BGA, Speed Grade 1, Commercial Grade, Pb-Free", Generic Part Number=XC7K160T, Manufacturer=Xilinx, Code_JEDEC=MS-034, ComponentLink1Description=Datasheet, ComponentLink1URL=http://www.xilinx.com/support/documentation/data_sheets/ds180_7Series_Overview.pdf, ComponentLink2Description="Package Specification", ComponentLink2URL=http://www.xilinx.com/support/documentation/user_guides/ug475_7Series_Pkg_Pinout.pdf, DatasheetVersion=v1.12, GTX=8, Mounting Technology="Surface Mount", PackageDescription="Flip-Chip Lidless BGA, Body 27 x 27 mm, 1.0 mm Pitch", PackageReference=FBG676, PackageVersion="Rev 1.8", PartNumber=XC7K160T-1FBG676C, RoHS=Pb-Free, SelectIO HP=150, SelectIO HR=250, Speed Grade=-1

## Via types
v1: diameter 24, hole 12, Top Layer to Bottom Layer, tented both sides, 423 vias
v2: diameter 24, hole 12, Top Layer to Bottom Layer, 1 vias

## Nets (pads, with @x,y where several pads share a name; then routed paths per layer and width w, separated by ;. In a path a pad name is that pad's centre, name@x,y a point inside that pad or via, vN(x,y) a via of type N, cw(c..) or ccw(c..) an arc to the next point about the centre after c; other vN are vias at no path point)
+1V0_VCCINT_SHUNTLOW: C46.1 C47.1 C48.1 C49.1 C50.1 C51.1 C52.1 C53.1 C54.1 C55.1 PWR1.23 PWR1.24 PWR1.25 U5.J9 U5.K8 U5.K10 U5.K12 U5.K14 U5.L9 U5.L13 U5.L15 U5.M8 U5.M14 U5.N9 U5.N13 U5.N15 U5.P14 U5.R13 U5.R15 U5.T12 U5.T14 U5.U13 U5.U15 | length 1730.2
  Top Layer w12: v1(3011.81,2736.22) U5.U13@3031.5,2716.54 ; U5.U15@3031.5,2637.8 v1(3051.18,2657.48) v1(3090.55,2696.85) U5.R13@3110.24,2716.54 U5.T12@3070.87,2755.91 ; U5.R15@3110.24,2637.8 v1(3129.92,2657.48) U5.P14@3149.61,2677.17 ; U5.N13@3188.98,2716.54 U5.P14@3149.61,2677.17 ; U5.N9@3188.98,2874.02 v1(3208.66,2893.7) U5.M8@3228.35,2913.39 3247.72,2894.02 v1(3247.72,2893.7) ; v1@3248.03,2893.7 U5.L9@3267.72,2874.02 ; U5.L15@3267.72,2637.8 v1(3287.4,2657.48) U5.K14@3307.09,2677.17 ; U5.K12@3307.09,2755.91 v1(3287.4,2736.22) U5.L13@3267.72,2716.54 v1(3248.03,2696.85) U5.M14@3228.35,2677.17 U5.N15@3188.98,2637.8 U5.P14@3149.61,2677.17 ; U5.K10@3307.09,2834.65 v1(3326.77,2854.33) ; U5.K8@3307.09,2913.39 v1(3326.77,2893.7) U5.J9@3346.46,2874.02
  Top Layer w20: v1(3346.46,3346.46) 3289.21,3346.46 3273.62,3362.05 C55.1@3273.62,3385.83 ; v1(3346.46,3385.83) C55.1@3273.62,3385.83 ; v1(3346.46,3425.2) 3289.21,3425.2 3273.62,3409.61 C55.1@3273.62,3385.83
  Bottom Layer w12: C48.1@3207.09,2933.07 3207.87,2932.28 3207.87,2894.49 v1(3208.66,2893.7) ; v1(3326.77,2893.7) 3326.77,2896.95 3332.3,2902.47 3332.3,2927.18 C47.1@3338.19,2933.07
  Bottom Layer w20: C46.1@3226.77,3307.09 3271.91,3307.09 v1(3279,3300) ; C53.1@3236.22,3385.83 v1(3346.46,3385.83) ; C52.1@3236.22,3454.72 3316.59,3454.72 3346.11,3425.2 v1(3346.46,3425.2) ; C51.1@3246.46,2736.22 3246.46,2699.51 3248.03,2697.93 v1(3248.03,2696.85) ; C54.1@3267.72,3562.99 3267.72,3535.43 3308.43,3494.72 3338.28,3494.72 v1(3347,3486) ; v1(3287.4,2657.48) 3288.17,2658.25 3335.8,2658.25 C50.1@3336.61,2659.06 ; v1(3287.4,2736.22) 3316.93,2765.75 C49.1@3357.87,2765.75
+1V2: P1.B9
+1V8: C21.1 C22.1 C23.1 C24.1 C25.1 C26.1 C27.1 C28.1 C29.1 C30.1 C31.1 C32.1 C33.1 C34.1 C35.1 C36.1 C37.1 C38.1 C39.1 C40.1 C41.1 C42.1 C43.1 C56.1 C57.1 C58.1 C59.1 C60.1 C61.1 C62.1 C63.1 J1.2 P1.A7 P1.A8 U5.A21 U5.AA1 U5.AA11 U5.AA21 U5.AB8 U5.AB18 U5.AC5 U5.AC15 U5.AC25 U5.AD2 U5.AD12 U5.AD22 U5.AE9 U5.AE19 U5.AF6 U5.AF16 U5.AF26 U5.B18 U5.C25 U5.D22 U5.E19 U5.F16 U5.F26 U5.G23 U5.H20 U5.J17 U5.K24 U5.L7 U5.L11 U5.L21 U5.M10 U5.M18 U5.N25 U5.P8 U5.P10 U5.P22 U5.R9 U5.R19 U5.T6 U5.T8 U5.T10 U5.T16 U5.T26 U5.U3 U5.U11 U5.U23 U5.V10 U5.V20 U5.W7 U5.W17 U5.Y4 U5.Y14 U5.Y24 | length 3713.4
  Top Layer w10: v1(2637.8,2598.43) U5.AF16@2677.17,2598.43 ; v1(2637.8,2992.13) U5.AF6@2677.17,2992.13 ; v1(2696.85,2459.19) 2696.85,2459.91 2716.54,2479.6 U5.AE19@2716.54,2480.32 ; U5.AE9@2716.54,2874.02 v1(2736.22,2893.7) ; v1(2736.22,2381.89) U5.AD22@2755.91,2362.2 ; v1(2736.22,2736.22) U5.AD12@2755.91,2755.91 ; v1(2736.22,3169.29) U5.AD2@2755.91,3149.61 ; v1(2775.59,2618.11) U5.AC15@2795.28,2637.8 ; v1(2775.59,3051.18) U5.AC5@2795.28,3031.5 ; v1(2814.96,2500) U5.AB18@2834.65,2519.69 ; U5.AB8@2834.65,2913.39 v1(2854.33,2933.07) ; v1(2854.33,2775.59) U5.AA11@2874.02,2795.28 ; U5.AA21@2874.02,2401.57 v1(2893.7,2421.26) ; v1(2893.7,2303.15) U5.Y24@2913.39,2283.46 ; v1(2893.7,2657.48) U5.Y14@2913.39,2677.17 ; v1(2893.7,3090.55) U5.Y4@2913.39,3070.87 ; v1(2933.07,2539.37) U5.W17@2952.76,2559.06 ; v1(2933.07,2972.44) U5.W7@2952.76,2952.76 ; v1(2972.44,2421.26) U5.V20@2992.13,2440.94 ; v1(2972.68,2854.31) 2972.68,2854.2 2992.13,2834.75 U5.V10@2992.13,2834.65 U5.U11@3031.5,2795.28 ; v1(3011.81,2342.52) U5.U23@3031.5,2322.83 ; v1(3011.81,3129.92) U5.U3@3031.5,3110.24 ; v1(3051.18,2578.74) U5.T16@3070.87,2598.43 ; v1(3051.18,2854.33) U5.T10@3070.87,2834.65 ; v1(3051.18,2933.07) U5.T8@3070.87,2913.39 ; v1(3051.18,3011.81) U5.T6@3070.87,2992.13 ; v1(3070.87,2155.51) U5.T26@3070.87,2204.72 ; v1(3090.55,2460.63) U5.R19@3110.24,2480.32 ; v1(3090.55,2893.7) U5.R9@3110.24,2874.02 U5.P10@3149.61,2834.65 ; U5.P22@3149.61,2362.2 v1(3169.29,2342.52) ; v1(3169.29,2224.41) U5.N25@3188.98,2244.09 ; U5.M18@3228.35,2519.69 v1(3248.03,2500) ; U5.M10@3228.35,2834.65 v1(3248.03,2814.96) U5.L11@3267.72,2795.28 ; U5.L21@3267.72,2401.57 v1(3287.4,2381.89) ; U5.L7@3267.72,2952.76 v1(3287.4,2972.44) ; U5.K24@3307.09,2283.46 v1(3326.77,2263.78) ; U5.J17@3346.46,2559.06 v1(3366.14,2539.37) ; U5.H20@3385.83,2440.94 v1(3405.51,2421.26) ; J1.2@3395.67,1564.96 3405.51,1555.12 v1(3454.72,1555.12) ; U5.G23@3425.2,2322.83 v1(3444.88,2303.15) ; v1(3454.72,2155.51) 3464.57,2165.35 U5.F26@3464.57,2204.72 ; U5.F16@3464.57,2598.43 v1(3484.25,2578.74) ; U5.E19@3503.94,2480.32 v1(3523.62,2460.63) ; U5.B18@3622.05,2519.69 v1(3641.73,2500)
  Top Layer w12: v1(2588.58,2198.69) 2591.83,2198.69 2597.86,2204.72 U5.AF26@2677.17,2204.72 ; v1(2775.59,2263.78) U5.AC25@2795.28,2244.09 ; v1(2854.33,3208.66) U5.AA1@2874.02,3188.98 ; U5.R9@3110.24,2874.02 U5.P8@3149.61,2913.39 ; U5.D22@3543.31,2362.2 v1(3562.99,2342.52) ; v1(3562.99,2263.78) U5.C25@3582.68,2244.09 ; U5.A21@3661.42,2401.57 v1(3700.79,2401.57)
  Top Layer w20: v1(2440.94,3385.83) 2379.76,3385.83 2364.17,3401.42 C43.1@2364.17,3425.2 ; v1(2440.94,3425.2) C43.1@2364.17,3425.2 ; v1(2440.94,3464.57) 2379.76,3464.57 2364.17,3448.98 C43.1@2364.17,3425.2
  Bottom Layer w6: 3267.72,2874.02 3267.72,2913.39
  Bottom Layer w10: C40.1@2696.85,2914.96 2704.45,2907.36 2704.45,2899.56 2709.22,2894.79 2735.13,2894.79 v1(2736.22,2893.7) ; v1(2736.22,3169.29) C29.1@2736.22,3220.08 ; v1(2775.59,3051.18) C28.1@2816.54,3051.18 ; v1(2814.96,2500) 2815.87,2500 2827.29,2488.58 C25.1@2854.33,2488.58 ; v1(2854.33,2775.59) C27.1@2854.33,2816.54 ; C30.1@2874.02,3131.5 2893.7,3111.81 v1(2893.7,3090.55) ; C59.1@2892.13,2539.37 v1(2933.07,2539.37) ; C35.1@2960.63,2480.32 2970.39,2470.55 2970.39,2450.31 2972.44,2448.26 v1(2972.44,2421.26) ; C34.1@2972.44,2895.67 2972.68,2895.43 v1(2972.68,2854.31) ; C58.1@3010.24,2578.74 v1(3051.18,2578.74) ; v1(3051.18,2854.33) C62.1@3101.97,2854.33 ; v1(3248.03,2814.96) 3248.03,2854.33 3267.72,2874.02 ; 3267.72,2913.39 3267.72,2952.76 v1(3287.4,2972.44)
  Bottom Layer w12: v1(3562.99,2342.52) C23.1@3603.94,2342.52
  Bottom Layer w20: v1(2736.22,3169.29) 2793.4,3169.29 2805.12,3181.01 C57.1@2805.12,3210.63 ; v1(3287.4,2972.44) 3288.17,2973.21 3288.17,3010.61 C33.1@3289.37,3011.81 ; v1(3562.99,2263.78) 3564.07,2263.78 3571.12,2256.73 3607.44,2256.73 C32.1@3612.2,2251.97
  Bottom Layer w25: P1.A8@1480,4359.8 1683.5,4359.8 1692.91,4350.39 ; P1.A7@1480,4399.17 1683.5,4399.17 1692.91,4389.76 ; C32.1@3612.2,2251.97 3731,2251.97 3744.09,2265.06 C37.1@3744.09,2283.46 3731,2296.56 3731,2371.36 v1(3700.79,2401.57)
+1V85_XADC_VCC: C3.1 C4.1 C20.1 L3.2 L4.2 R1.1 U1.1 U2.5 U5.M12 | length 4119
  Top Layer w5: v1(3208.66,2775.59) U5.M12@3228.35,2755.91
  Top Layer w12: U1.1@4535.43,2590.55 4539.37,2594.49 4612.2,2594.49 C4.1@4616.14,2598.43 4753.94,2598.43 4763.78,2608.27 4763.78,2903.54 4714.57,2952.76 ; L3.2@4538.19,3927.17 4538.19,3542.52 4577.56,3503.15 L4.2@4665.35,3503.15 4670.87,3503.15 4701.18,3533.46 4793.31,3533.46 4842.52,3484.25 4842.52,3080.71 4714.57,2952.76 ; C3.1@4553.15,2956.69 C3.1@4553.15,2952.76 ; R1.1@4645.67,2864.17 4607.29,2864.17 4589.57,2881.89 U2.5@4580.71,2881.89 4571.85,2881.89 4553.15,2900.59 C3.1@4553.15,2952.76 ; C3.1@4553.15,2952.76 v1(4616.14,2952.76) 4714.57,2952.76
  Bottom Layer w10: C20.1@3208.66,2814.96 v1(3208.66,2775.59) 3208.66,2772.35 3195.13,2758.82 3193.5,2758.82 3179.13,2744.46 3179.13,2687.01 3230.66,2635.48 3299.56,2635.48 3332.47,2602.57 3358.86,2602.57 3396.4,2640.11 3506.42,2640.11 3552.79,2593.74 3627.2,2593.74 3668.92,2635.45 4072.46,2635.45 4133.86,2696.85 4133.86,2746.06 4153.54,2765.75 4458.66,2765.75 4616.14,2923.23 v1(4616.14,2952.76)
+3V3: C1.1 C44.1 C45.1 L1.1 P1.A3 P1.A4 | length 4503.7
  Top Layer w12: v1(1899.61,3976.38) 2027.56,3848.43 4117.17,3848.43 4214.99,3750.61 4214.99,3472.02 4232.28,3454.72 4232.28,2923.23 4251.97,2903.54 C1.1@4311.02,2903.54 4330.71,2883.86 L1.1@4361.02,2883.86
  Layer 3 w12: v1(1824,4420) 1855,4389 1855,4020.98 v1(1899.61,3976.38)
  Bottom Layer w12: P1.A4@1480,4517.28 1614.97,4517.28 1622,4524.31 1622,4555.77 ; P1.A3@1480,4556.65 1480.88,4555.77 1622,4555.77 ; C44.1@1670,4554.89 C44.1@1669.12,4555.77 ; v1(1824,4420) 1824,4526 1794.23,4555.77 C44.1@1669.12,4555.77 ; 1622,4555.77 C44.1@1669.12,4555.77